# Altium PCB Zybo_Z7_Pcb.PcbDoc (part 1 of 8)
Units mm, origin at the board's own origin, x right, y up, seen from the top; angles counter-clockwise.
Board outline 122 x 88 mm, 8 copper layers (Top Layer, Layer 2, Layer 3, Layer 4, Layer 5, Layer 6, Layer 7, Bottom Layer), stack 1.625 mm thick; 658 components, 558 nets, 2538 pads, 924 vias.
Unrouted connection lines stored in the file: 1229.
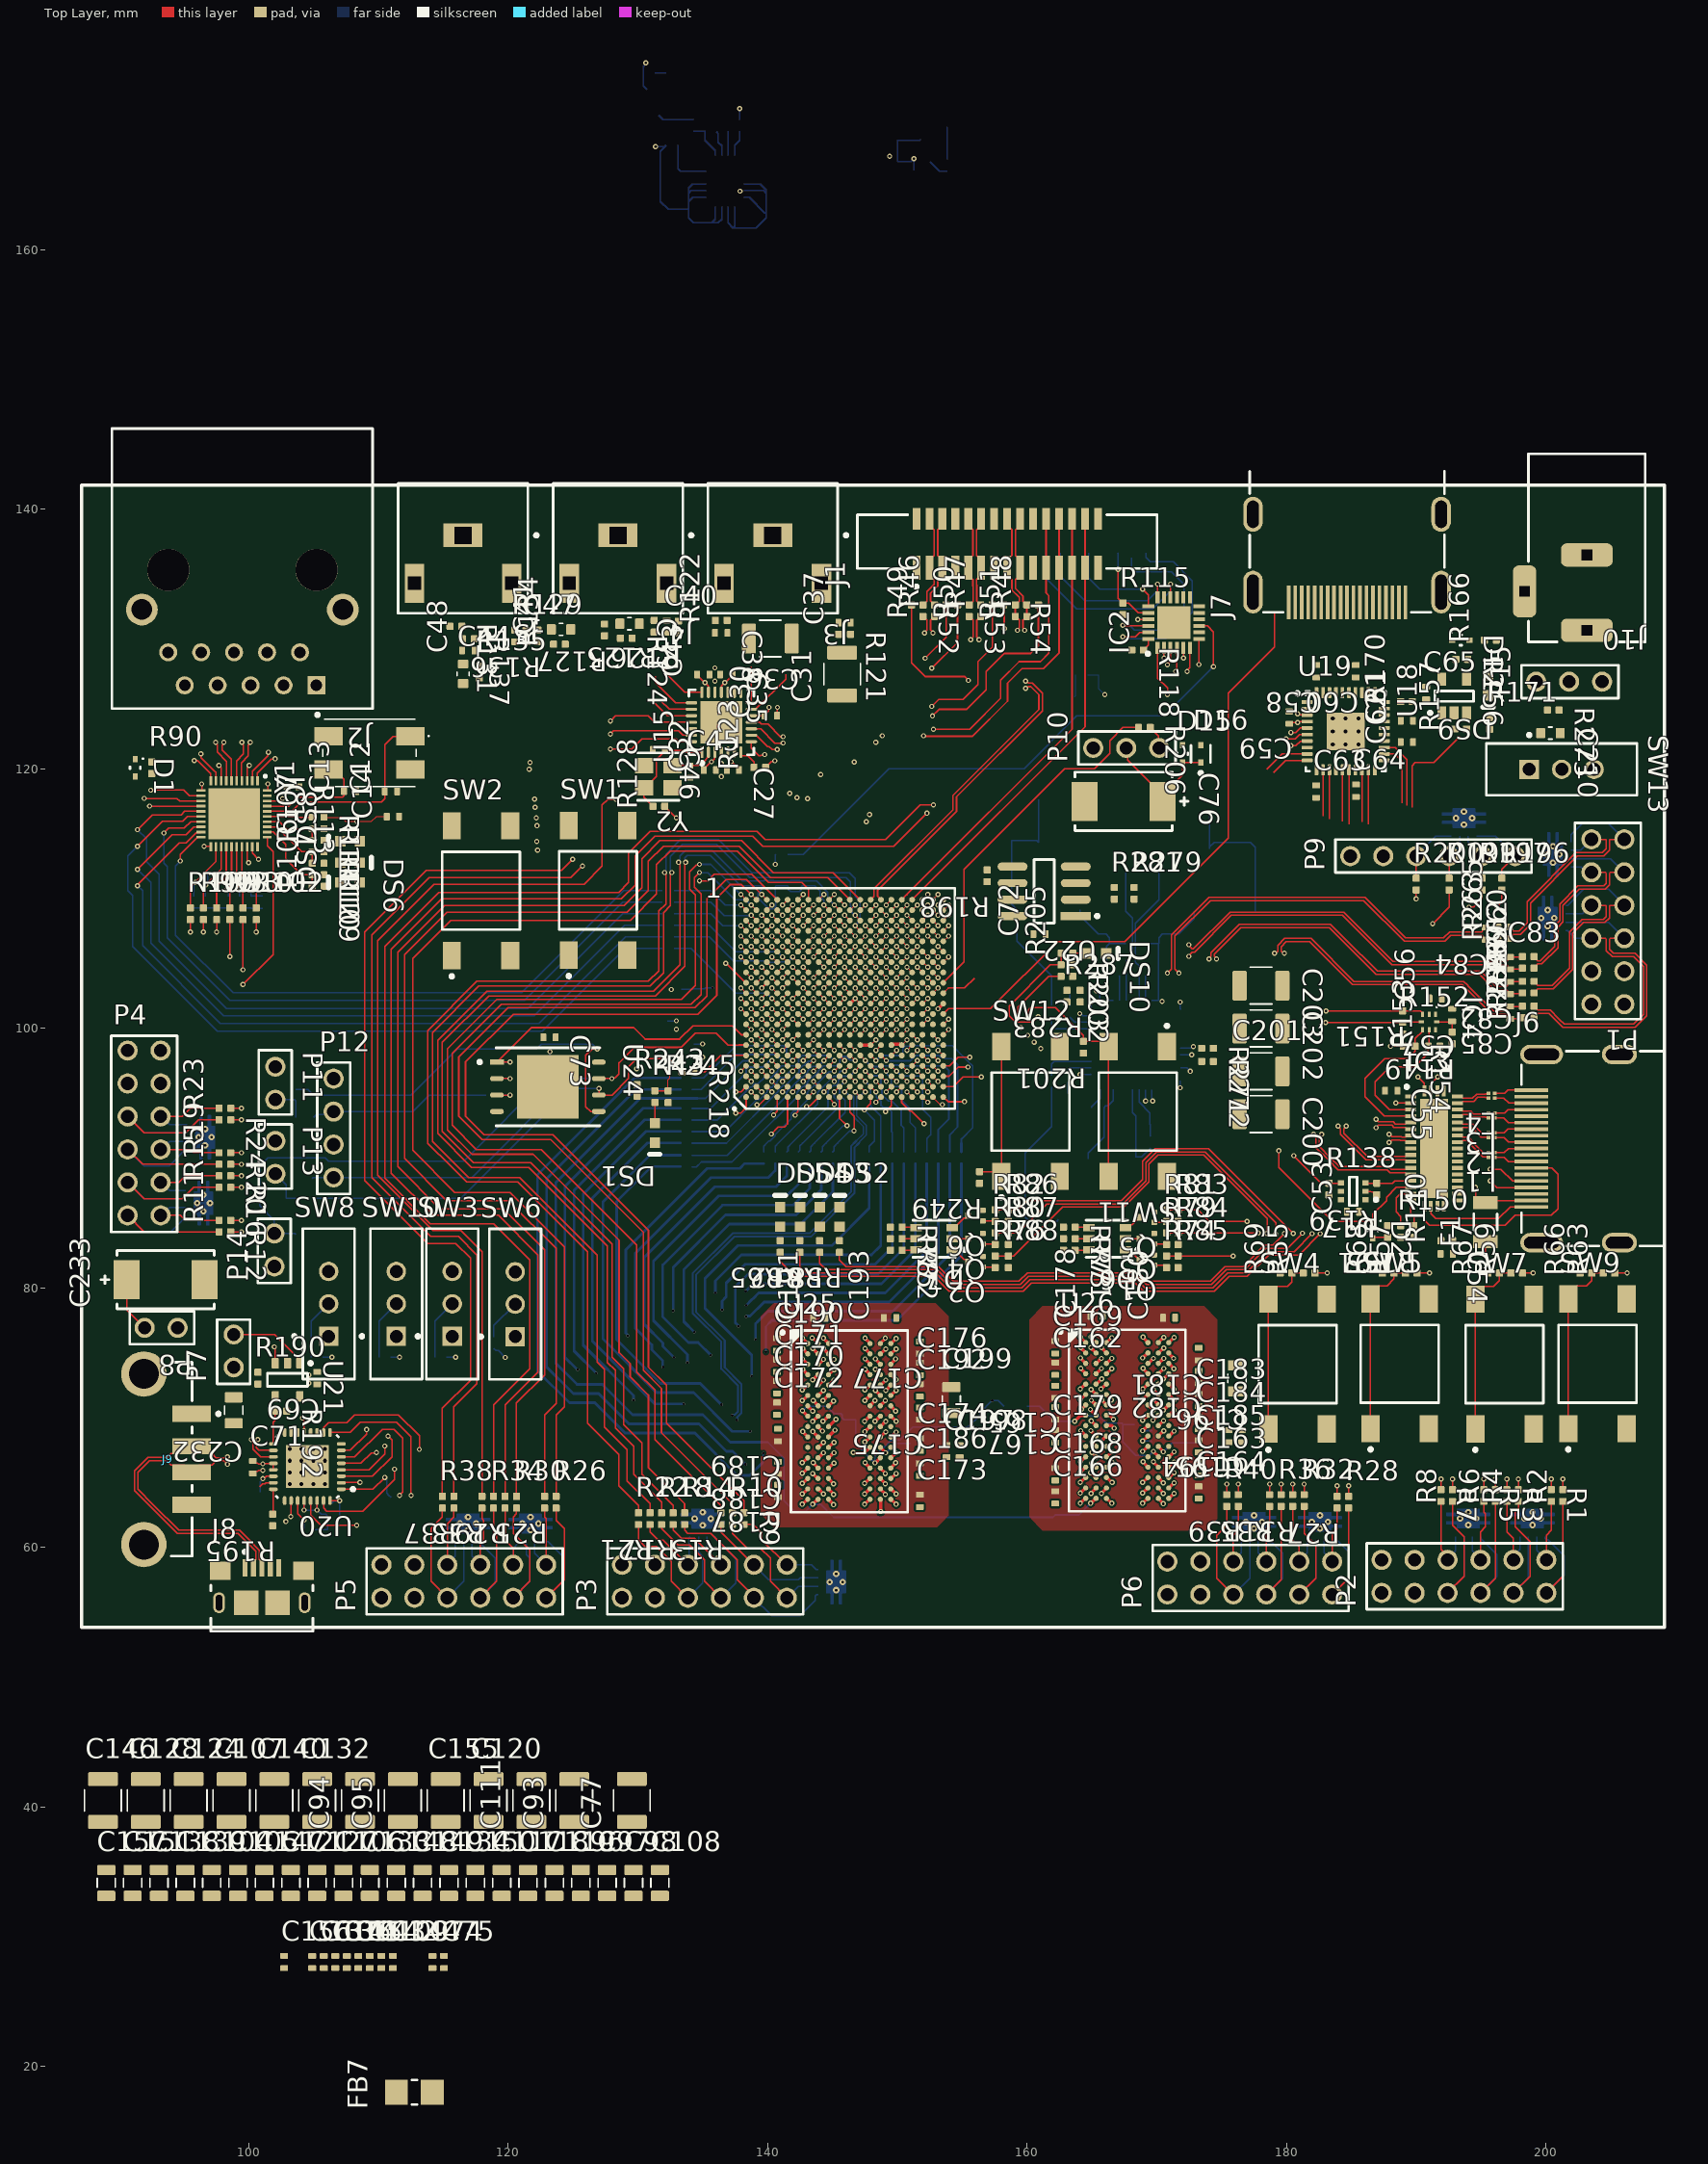
[diagram p0: Top Layer view]
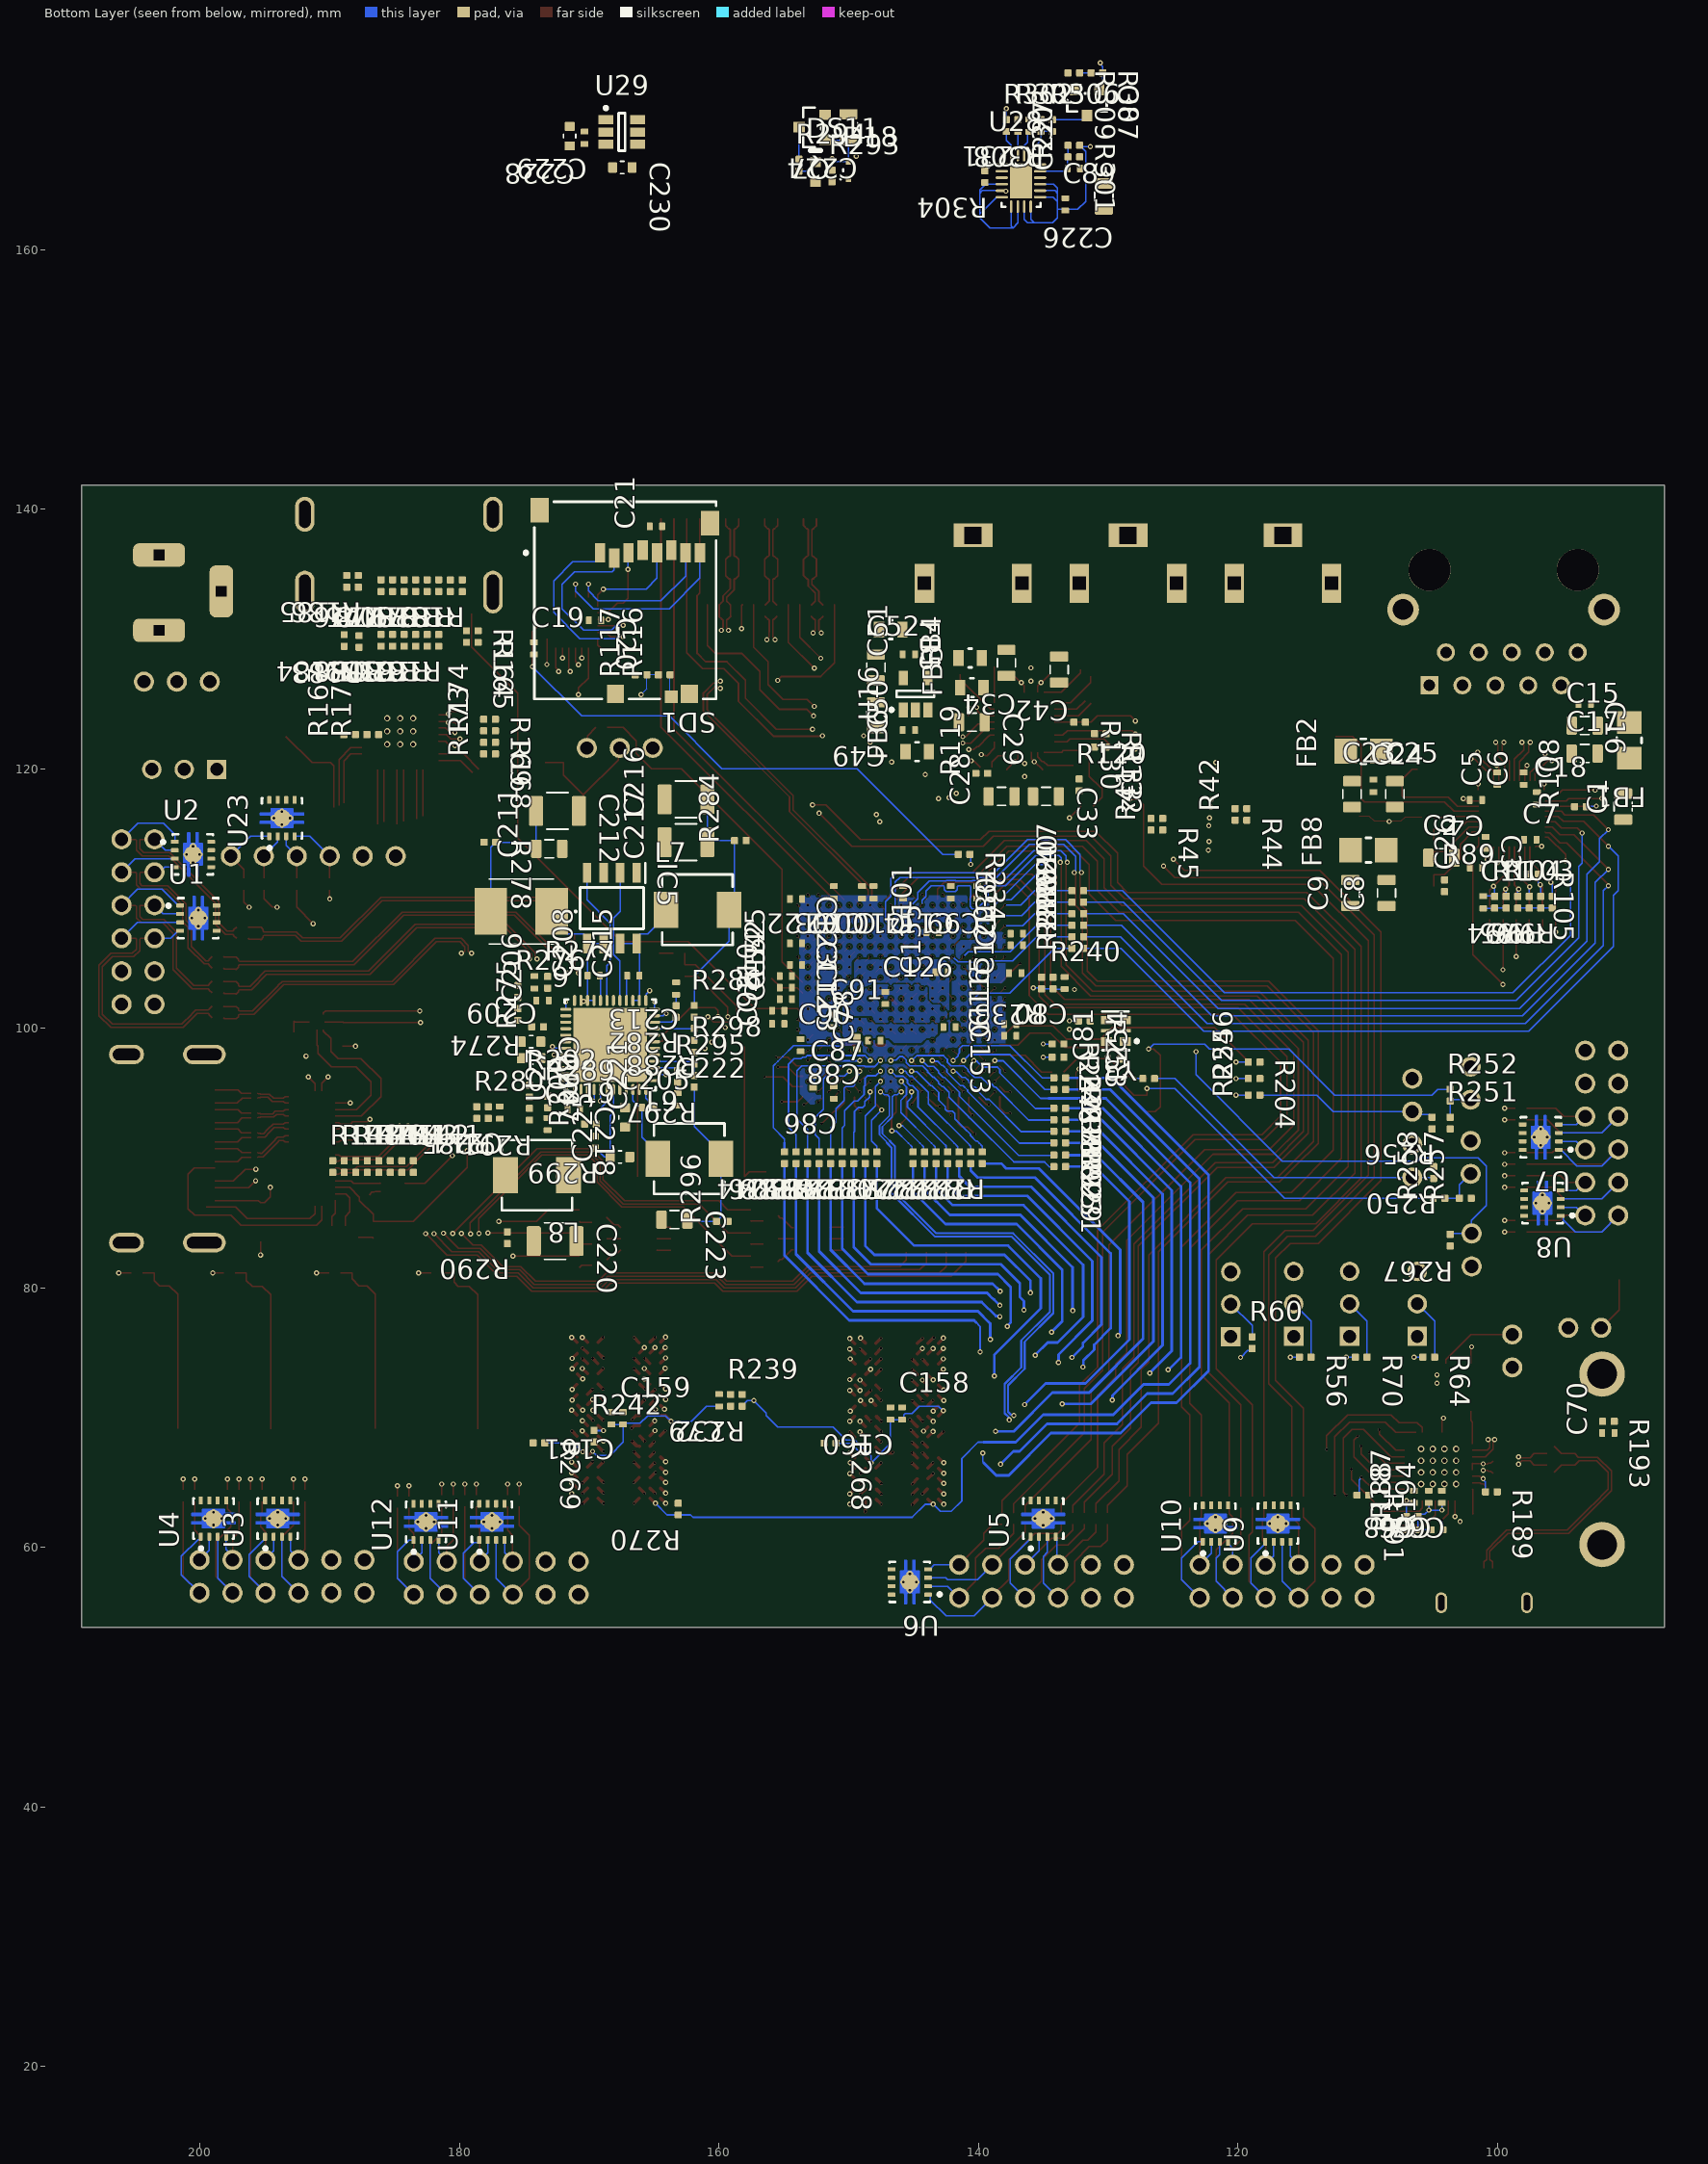
[diagram p1: Bottom Layer view, seen from below]
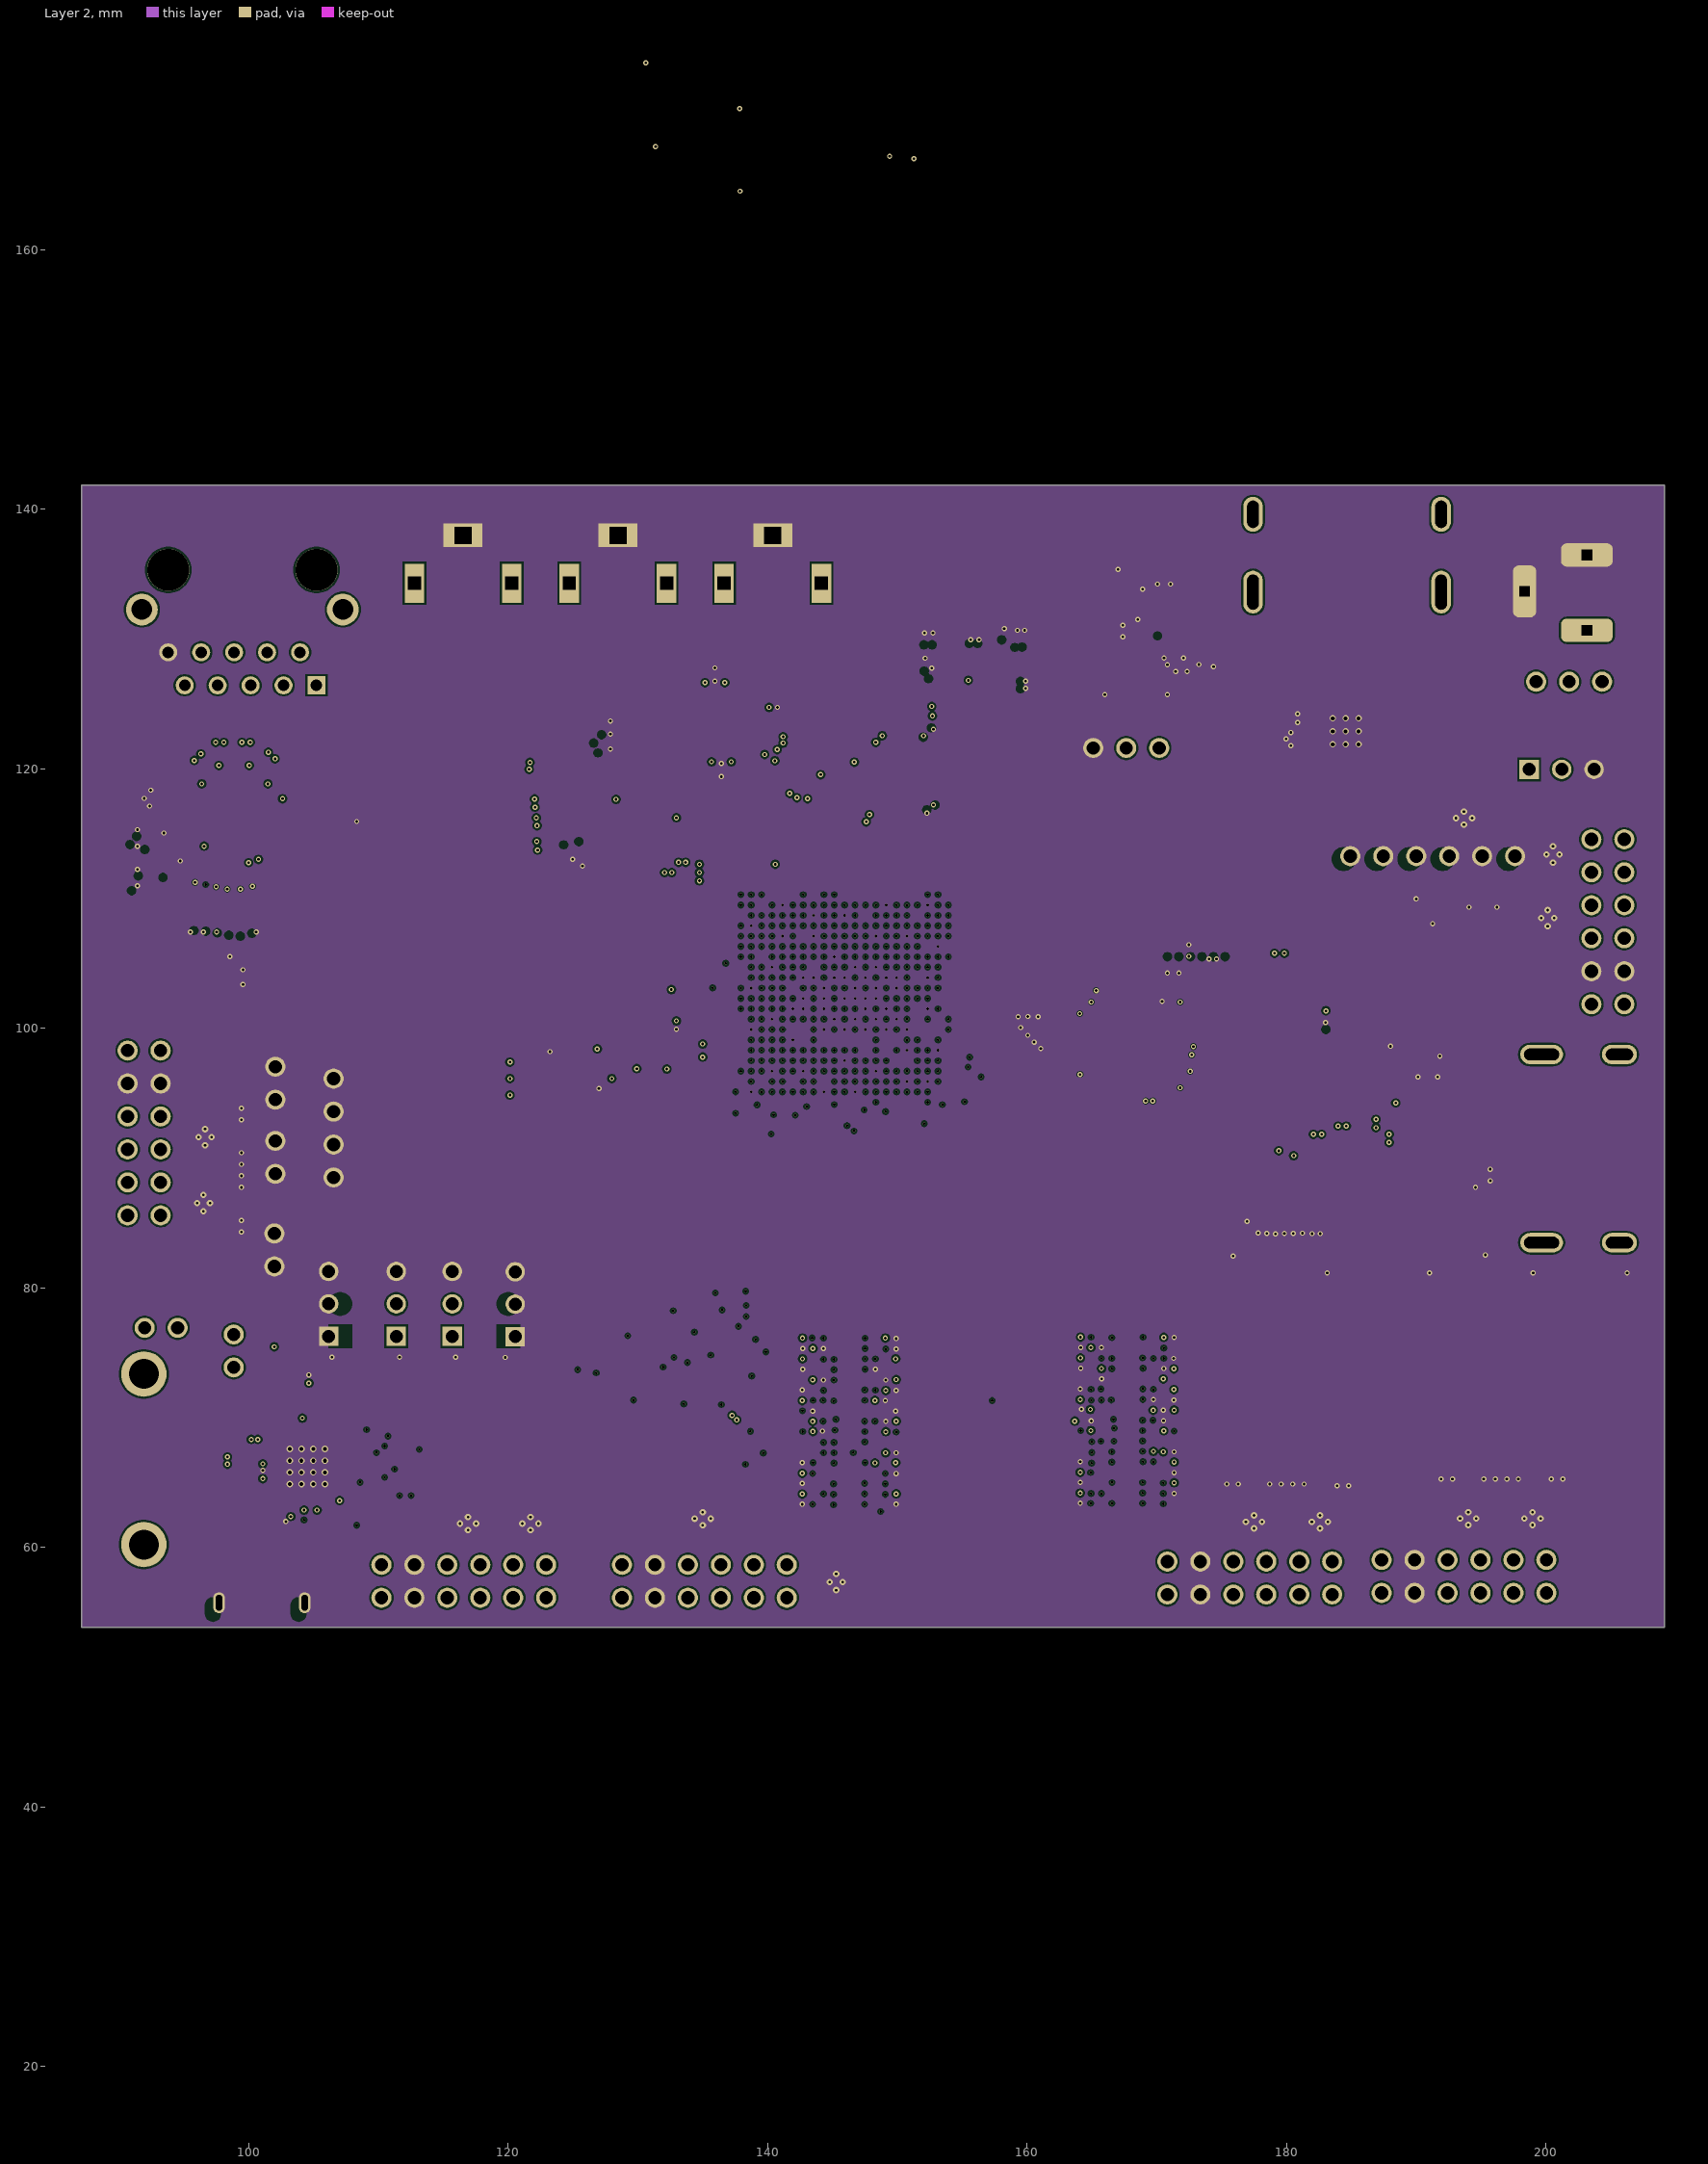
[diagram p2: Layer 2]
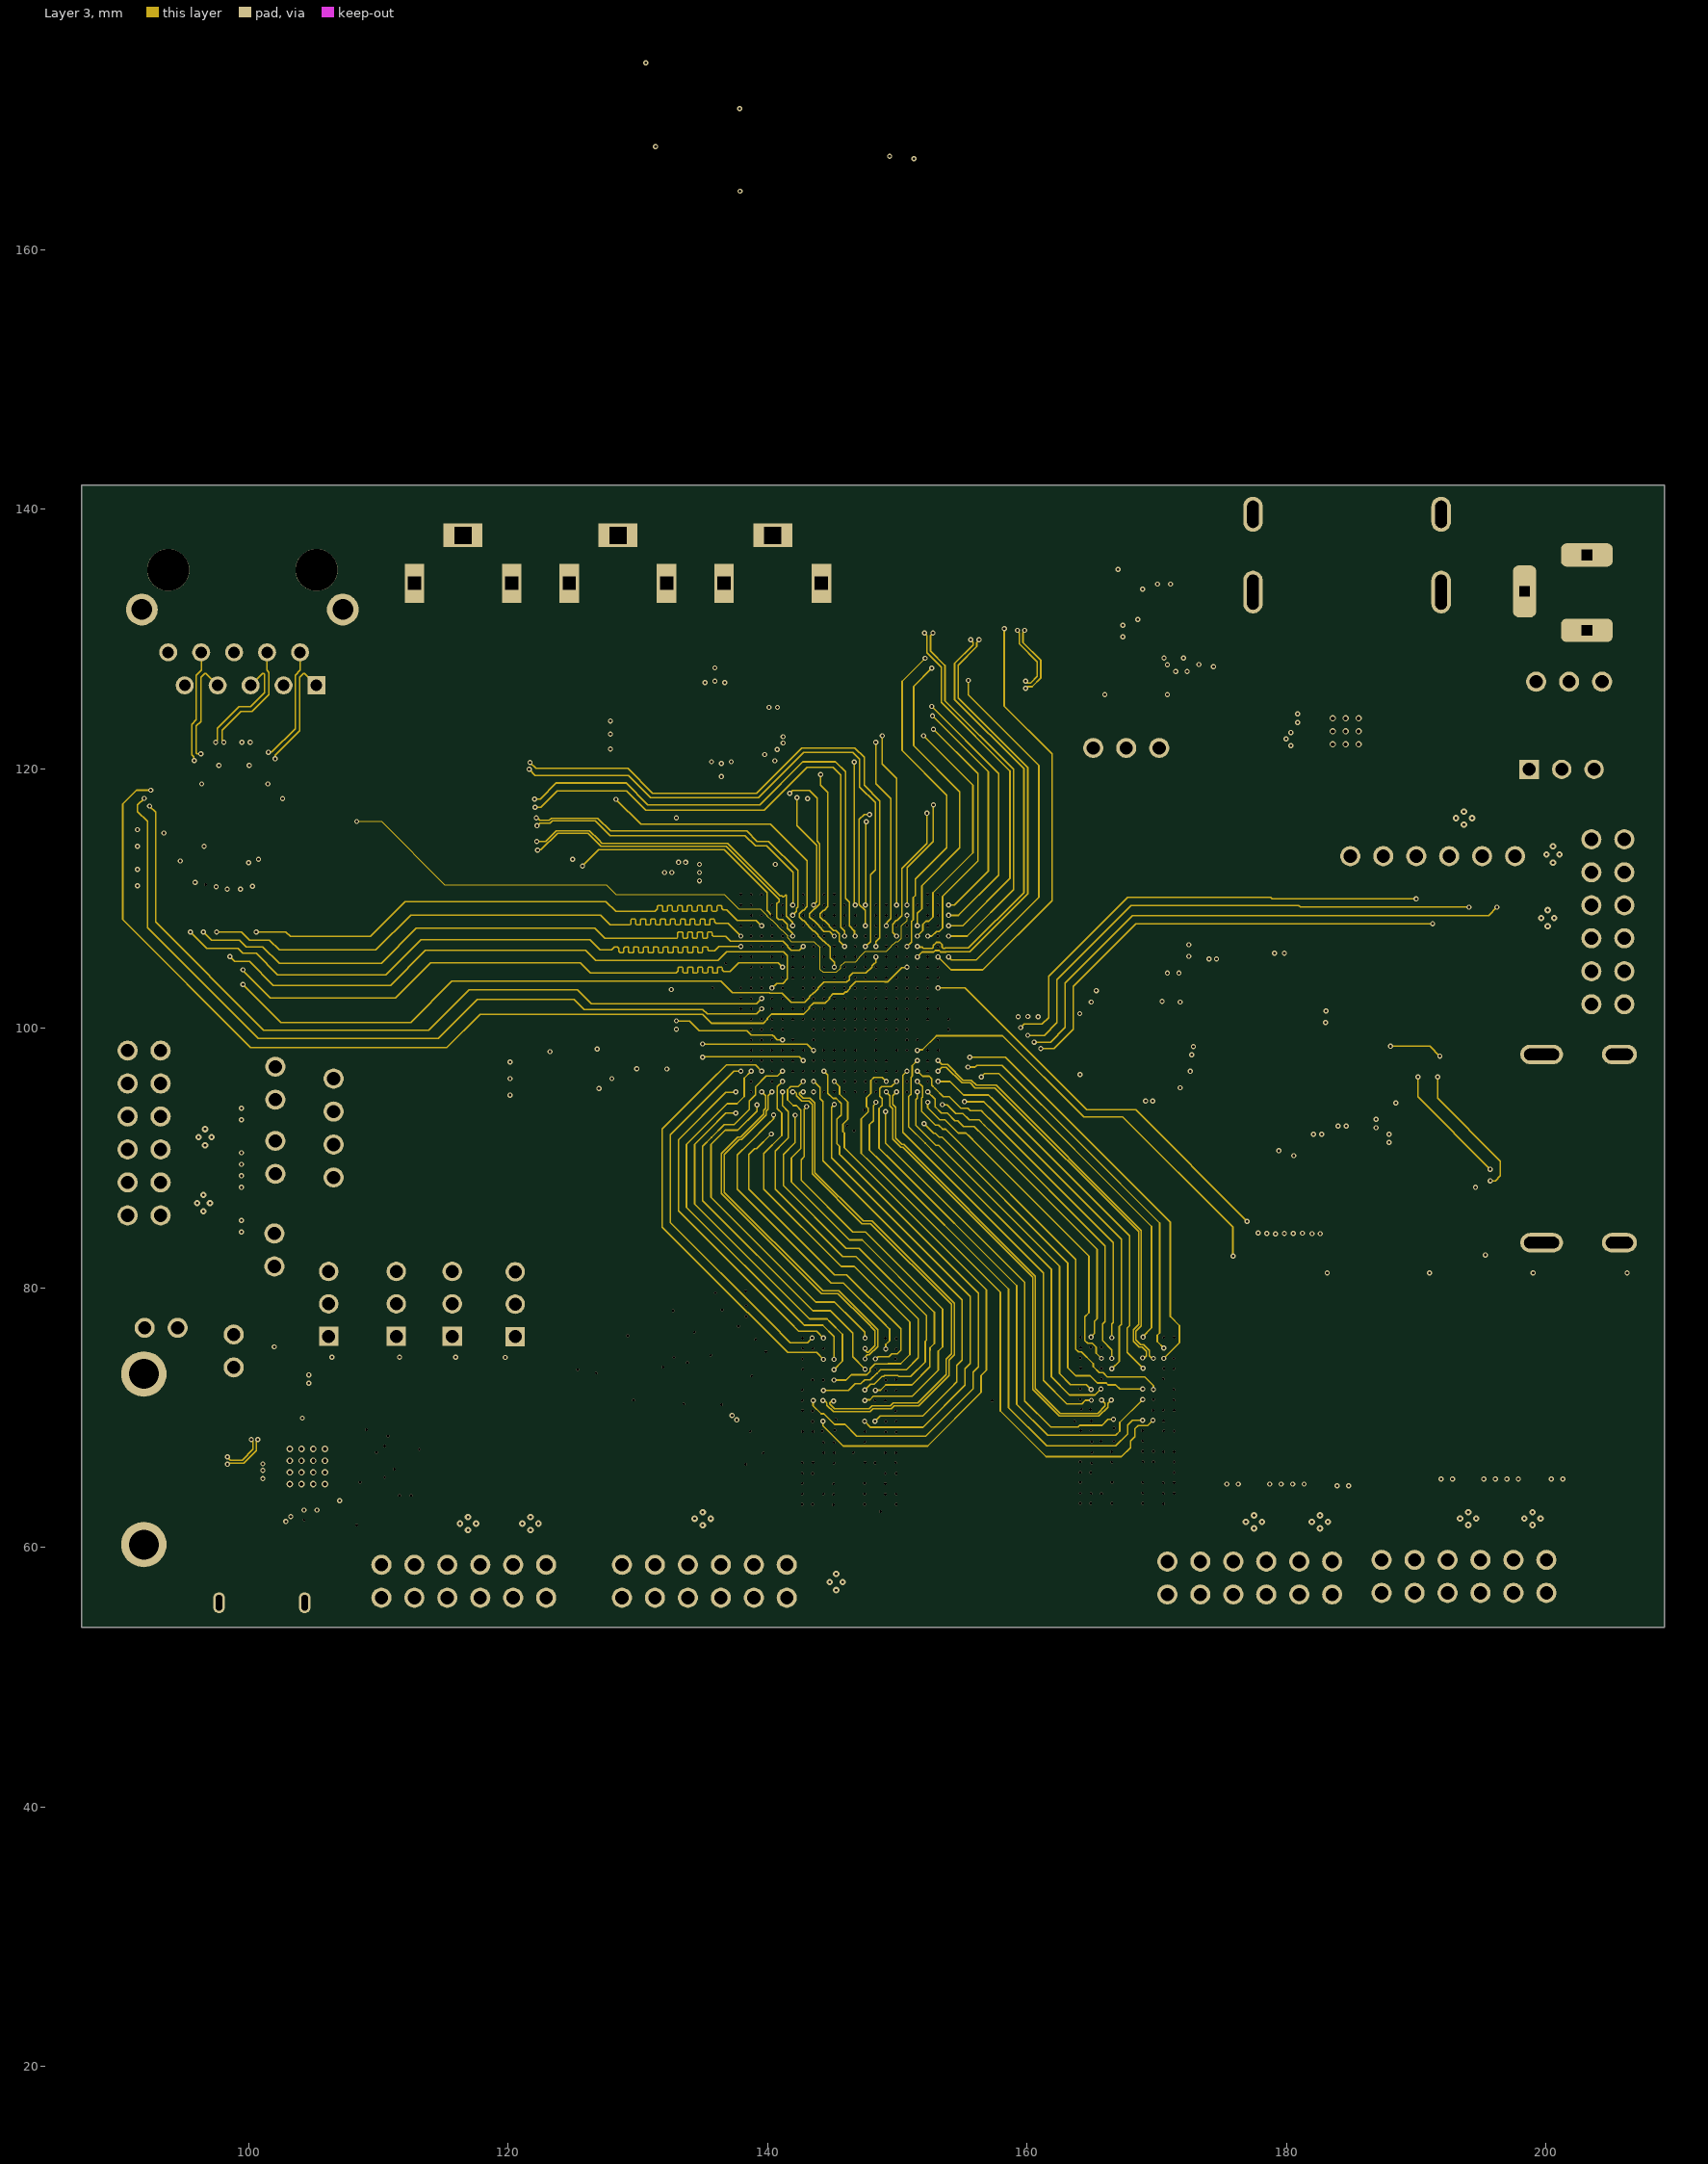
[diagram p3: Layer 3]
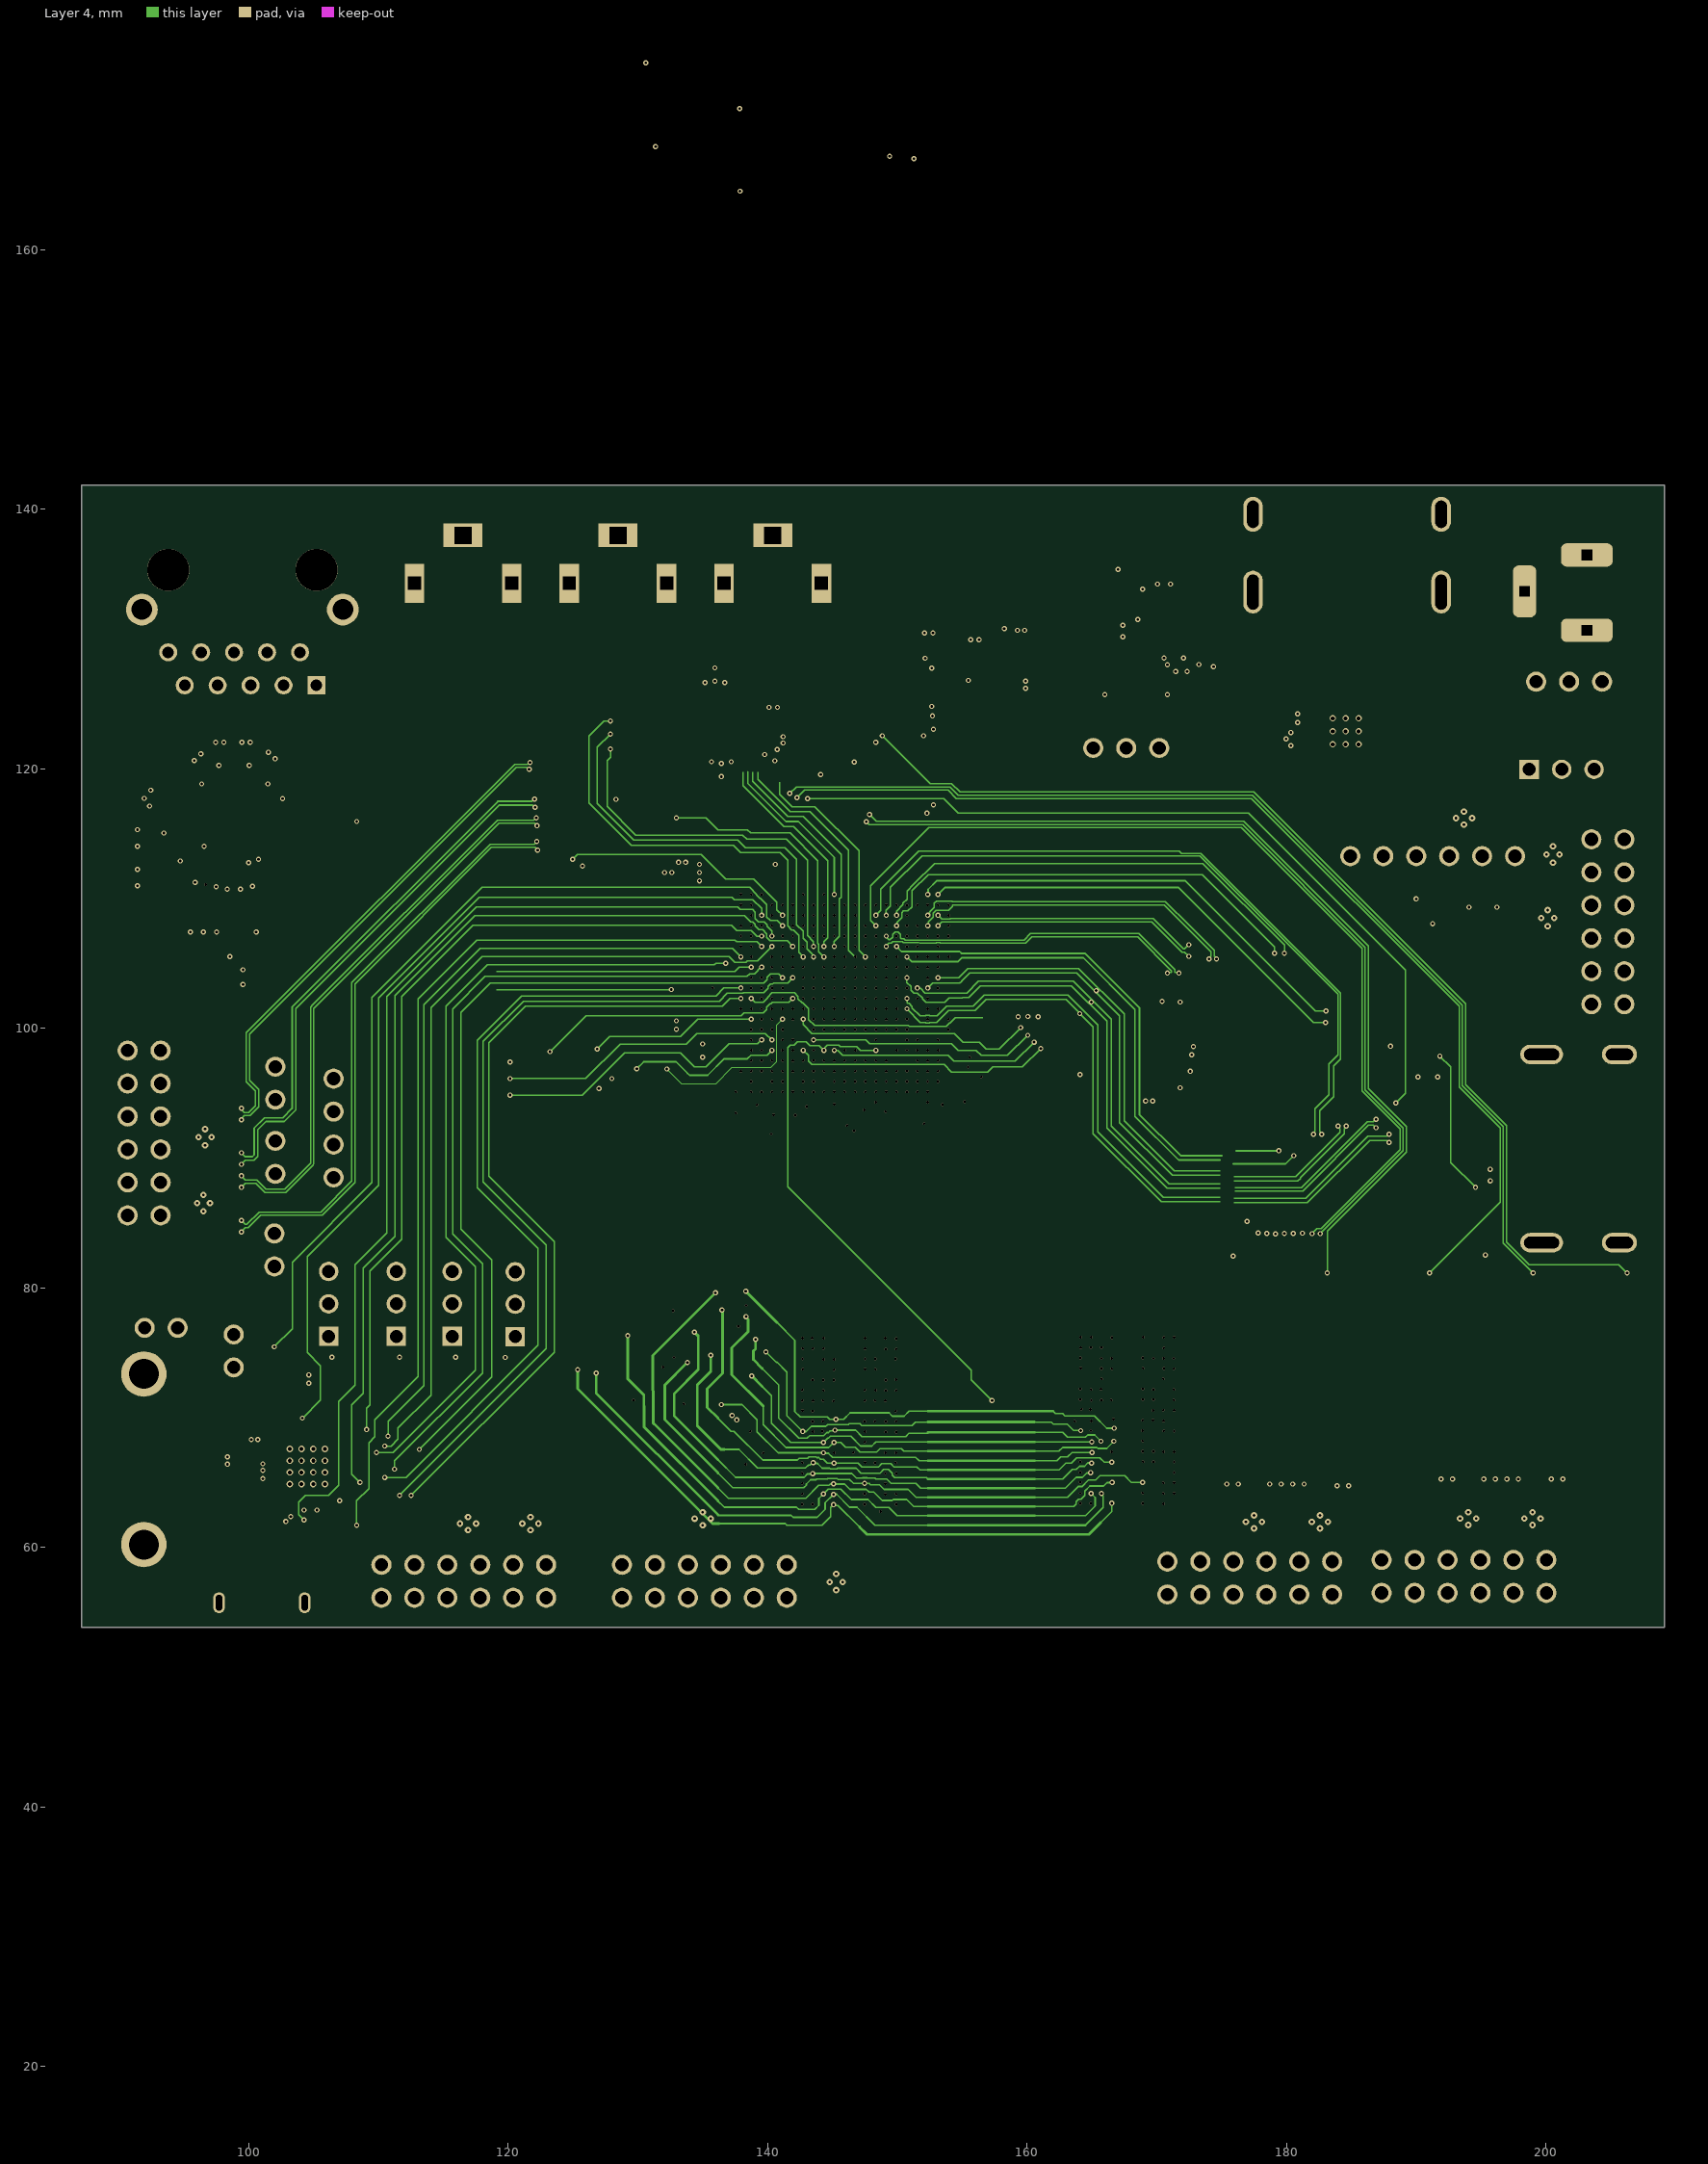
[diagram p4: Layer 4]
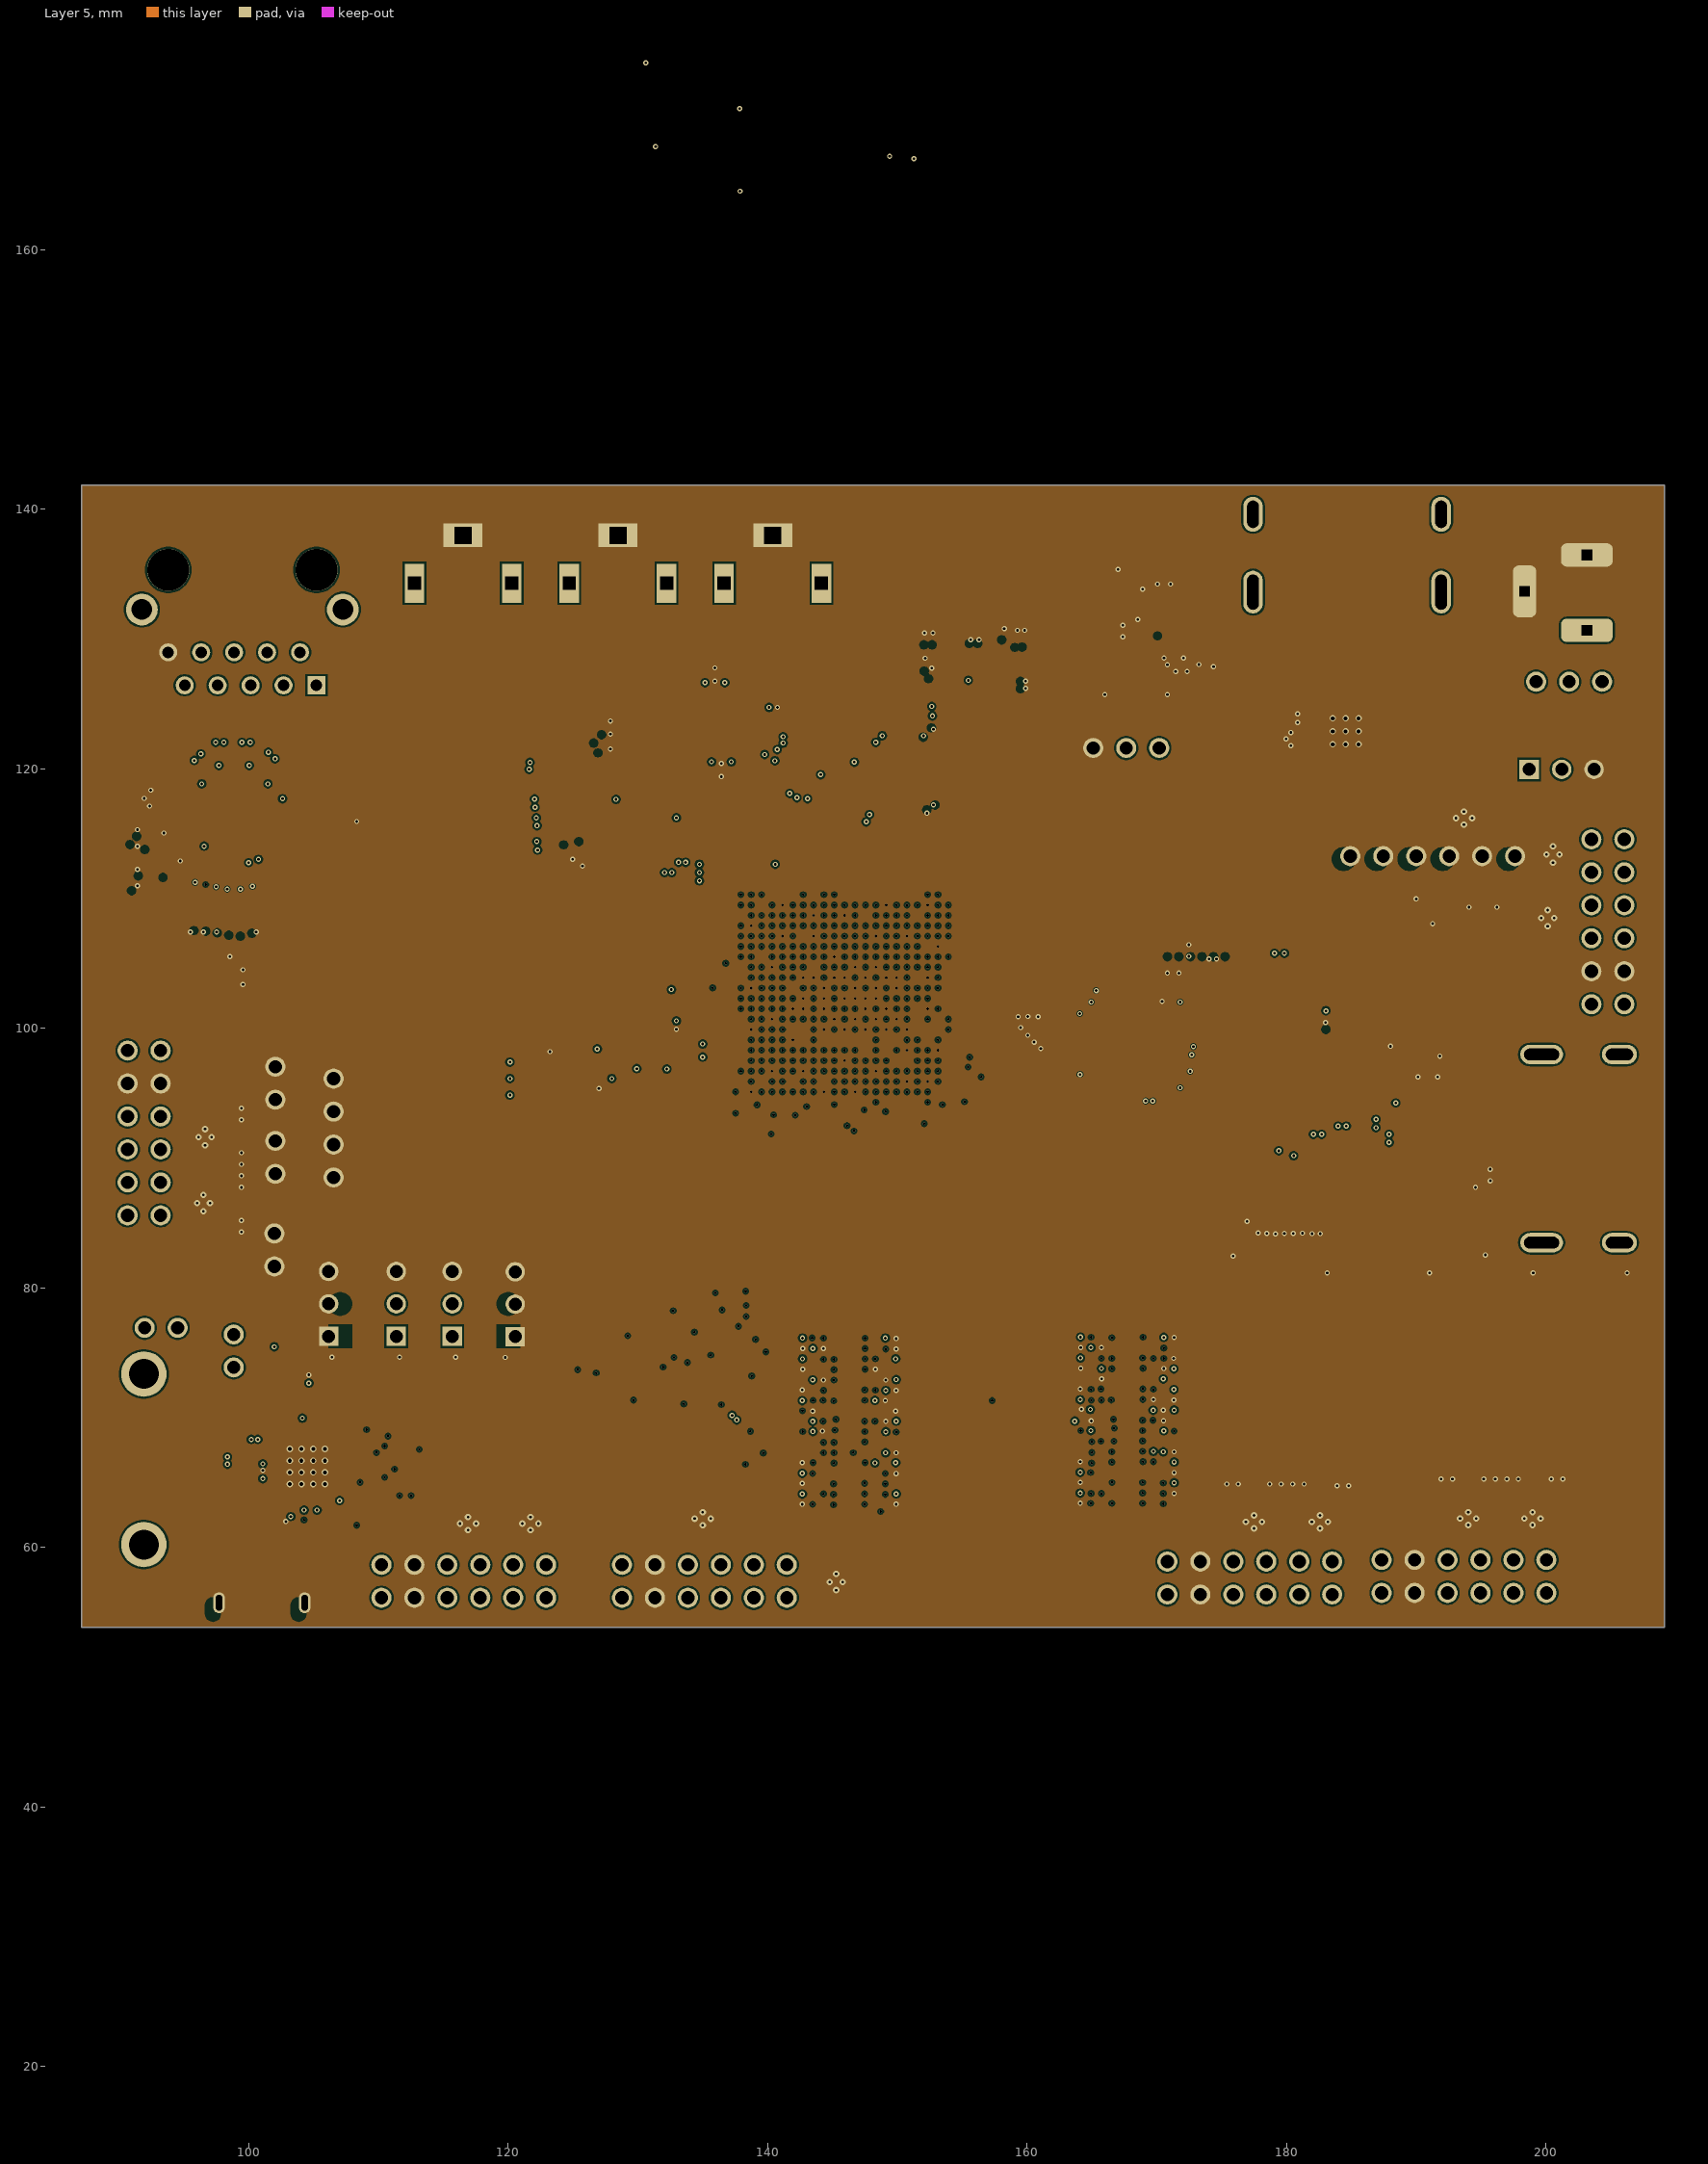
[diagram p5: Layer 5]
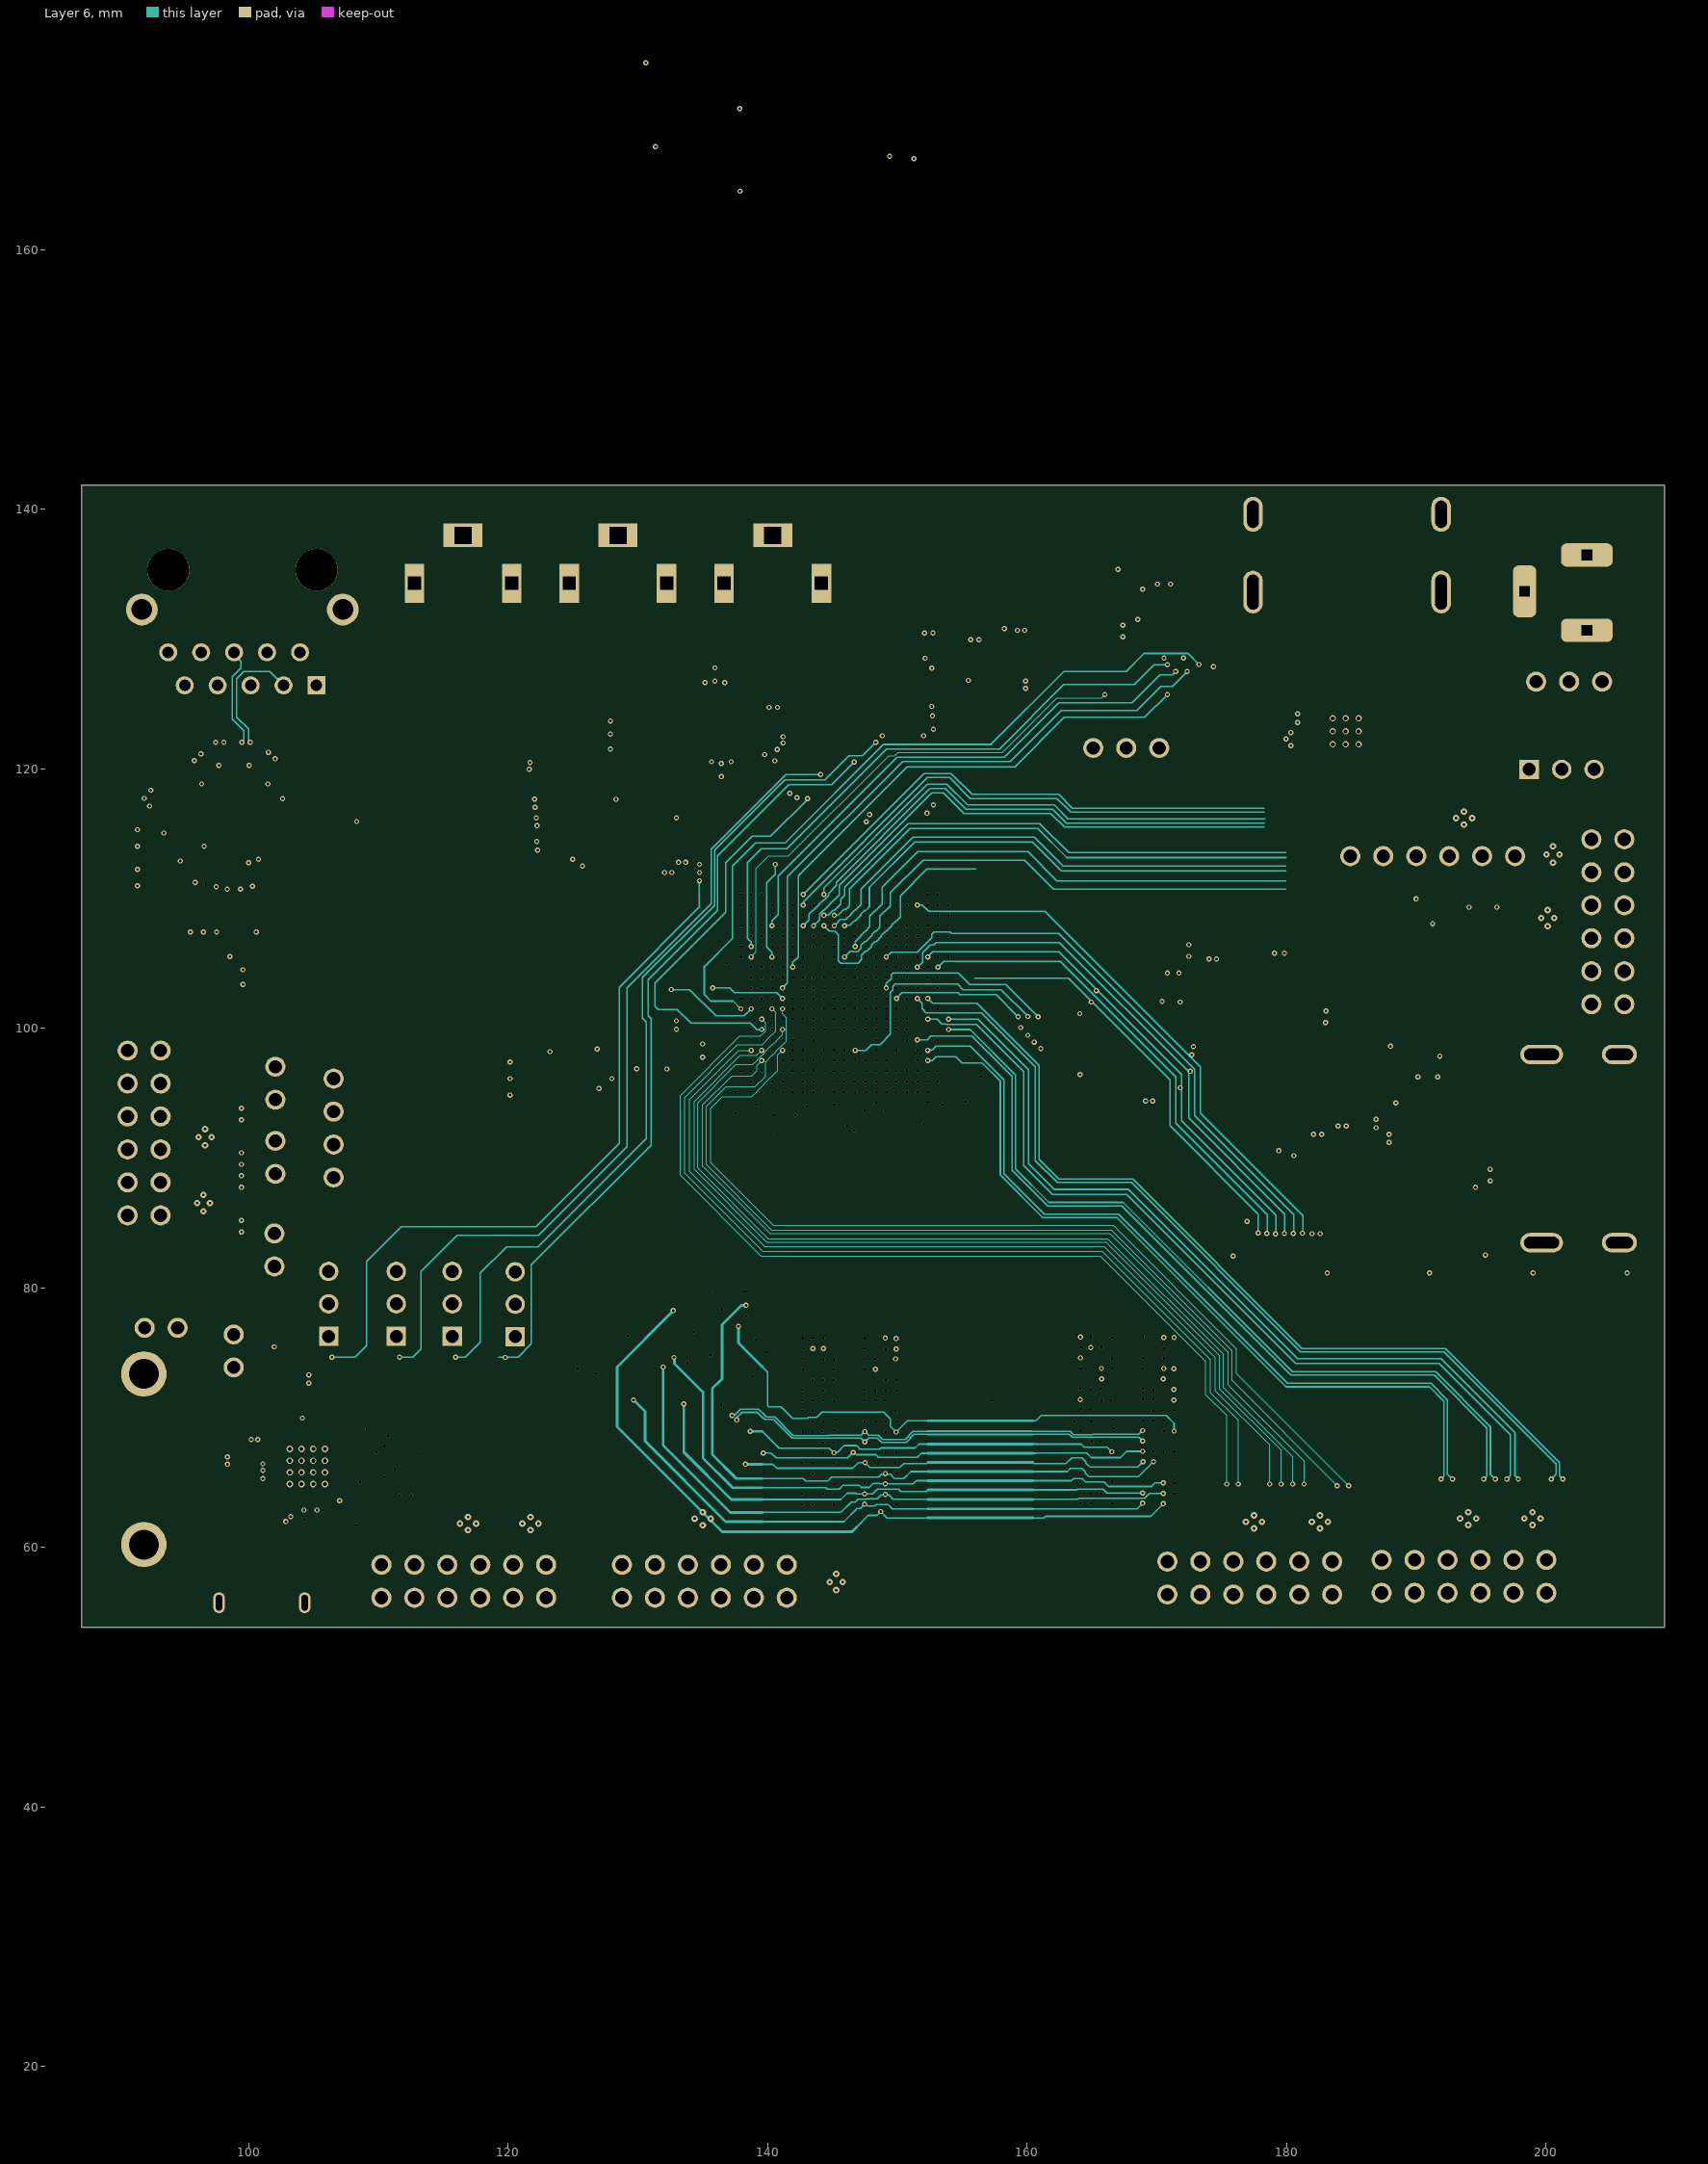
[diagram p6: Layer 6]
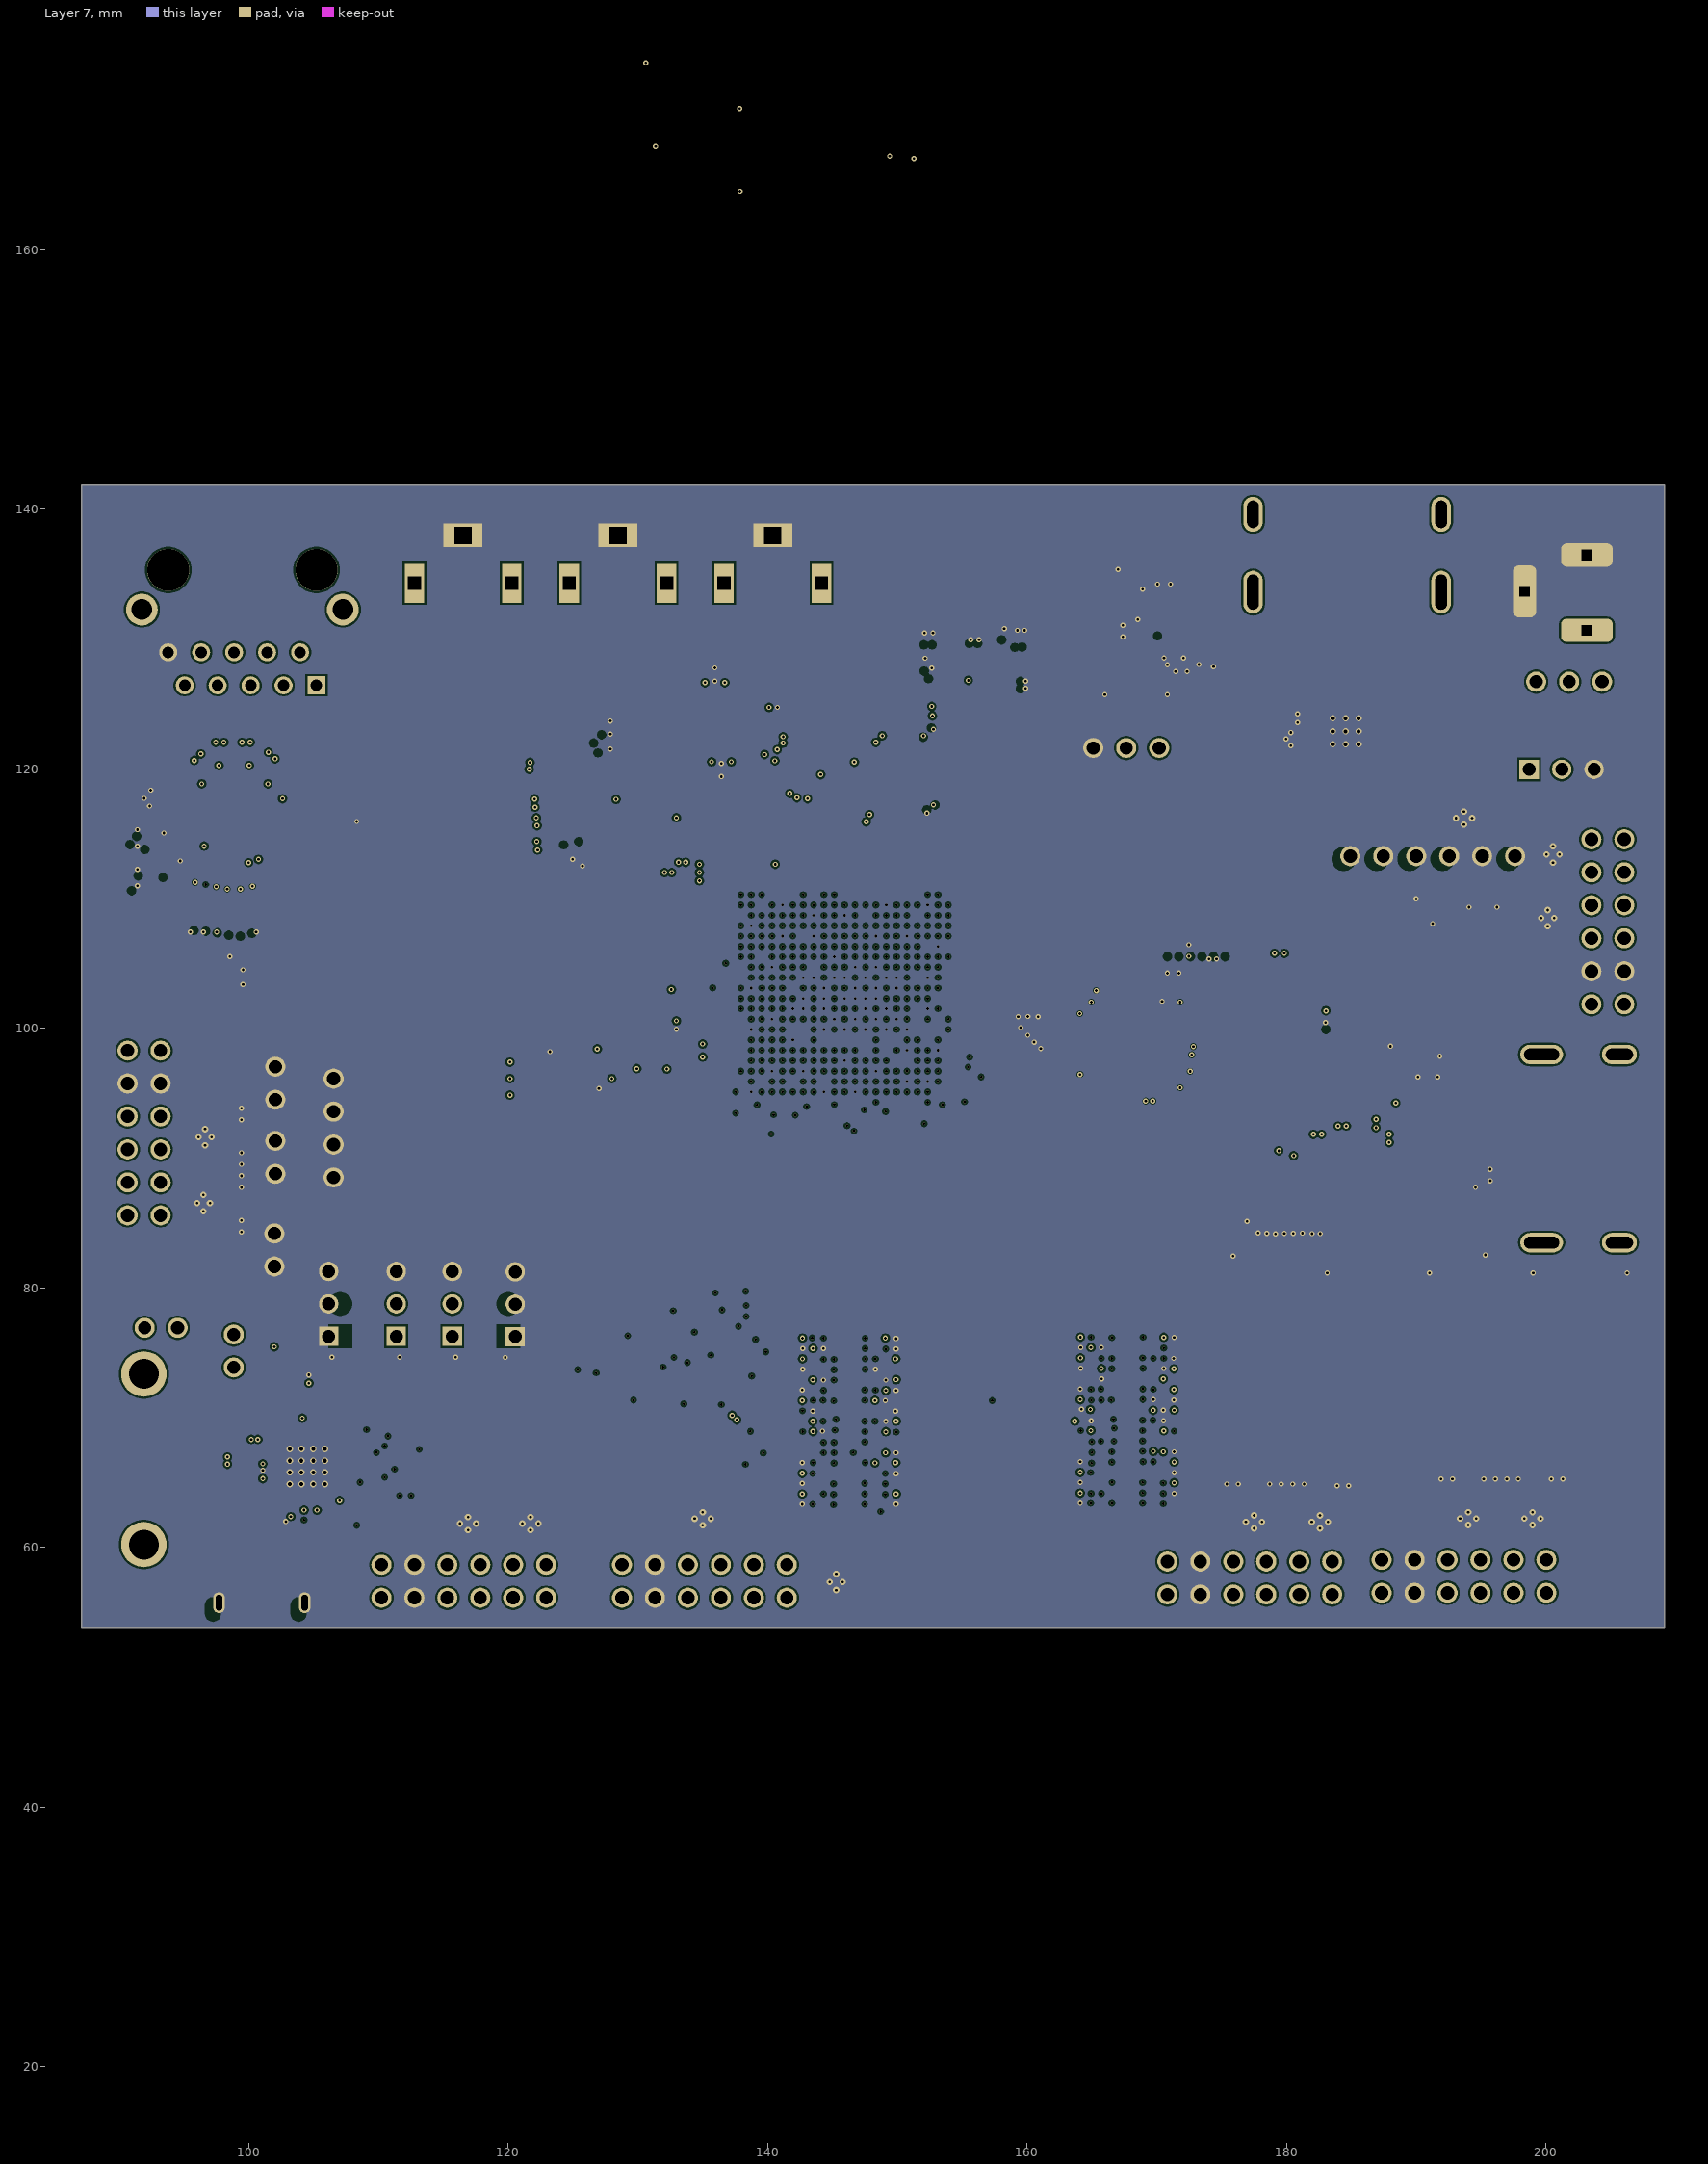
[diagram p7: Layer 7]

## Layer stack, top to bottom
Top Solder: solder mask 0.0102, Solder Resist, Dk 3.5
Top Layer: signal copper 0.0356
1080 RC67% 3.3mil: prepreg 0.0764, PP-006, Dk 3.91
Layer 2: signal copper 0.0152
Core1: prepreg 0.1, PP-006, Dk 4.36
Layer 3: signal copper 0.0152
Dielectric 6: prepreg 0.5048, PP-006, Dk 4.32
Layer 4: signal copper 0.0152
Core2: dielectric 0.1, FR-4, Dk 4.36
Layer 5: signal copper 0.0152
Dielectric 7: prepreg 0.5048, PP-006, Dk 4.32
Layer 6: signal copper 0.0152
Core3: prepreg 0.1, PP-006, Dk 4.36
Layer 7: signal copper 0.0152
Dielectric 3: prepreg 0.0764, PP-006, Dk 3.91
Bottom Layer: signal copper 0.0356
Bottom Solder: solder mask 0.0102, Solder Resist, Dk 3.5

## Board outline
87.122,53.859 87.122,141.859 209.122,141.859 209.122,53.859

## Design rules (kind name [scope] priority, off if disabled: settings)
Clearance DDR_ADR_CTRL_FPGA_Clearance [WithinRoom('DDR_ADR_CTRL_FPGA') and InNetClass('DDR_ADR_CTRL')] p1: gap=0.15 ignorepadtopadclearanceinfootprint=TRUE except(0.13: Arc-Arc Arc-Track Arc-Via Arc-Fill Arc-Poly Arc-Region Track-Track Track-Via Track-Fill Track-Poly Track-Region; 0.254: Arc-Text Track-Text SMDPad-Text THPad-Text Via-Text Fill-Text Poly-Text Region-Text Text-Text)
Clearance DDR_ADR_CTRL_DDR_Clearance [WithinRoom('DDR_1') or WithinRoom('DDR_2') and InNetClass('DDR_ADR_CTRL')] p2: gap=0.15 ignorepadtopadclearanceinfootprint=TRUE except(0.13: Arc-Arc Arc-Track Arc-Via Arc-Fill Arc-Poly Arc-Region Track-Track Track-Via Track-Fill Track-Poly Track-Region; 0.254: Arc-Text Track-Text SMDPad-Text THPad-Text Via-Text Fill-Text Poly-Text Region-Text Text-Text)
Clearance DDR_Data_Byte1_FPGA_Clearance [WithinRoom('DDR_B1_D_FPGA') and InNetClass('DDR_B1_D')] p3: gap=0.15 ignorepadtopadclearanceinfootprint=TRUE except(0.137: Arc-Arc Arc-Track Arc-Via Track-Track Track-Via; 0.254: Arc-Text Track-Text SMDPad-Text THPad-Text Via-Text Fill-Text Poly-Text Region-Text Text-Text)
Clearance DDR_Data_Byte1_DDR_Clearance [WithinRoom('DDR_1') or WithinRoom('DDR_2') and InNetClass('DDR_B1_D')] p4: gap=0.15 ignorepadtopadclearanceinfootprint=TRUE except(0.137: Arc-Arc Arc-Track Arc-Via Track-Track Track-Via; 0.254: Arc-Text Track-Text SMDPad-Text THPad-Text Via-Text Fill-Text Poly-Text Region-Text Text-Text)
Clearance DDR_Data_Byte2_FPGA_Clearance [WithinRoom('DDR_B2_D_FPGA') and InNetClass('DDR_B2_D')] p5: gap=0.15 ignorepadtopadclearanceinfootprint=TRUE except(0.137: Arc-Arc Arc-Track Arc-Via Track-Track Track-Via; 0.254: Arc-Text Track-Text SMDPad-Text THPad-Text Via-Text Fill-Text Poly-Text Region-Text Text-Text)
Clearance DDR_Data_Byte2_DDR_Clearance [WithinRoom('DDR_1') or WithinRoom('DDR_2') and InNetClass('DDR_B2_D')] p6: gap=0.15 ignorepadtopadclearanceinfootprint=TRUE except(0.137: Arc-Arc Arc-Track Arc-Via Track-Track Track-Via; 0.254: Arc-Text Track-Text SMDPad-Text THPad-Text Via-Text Fill-Text Poly-Text Region-Text Text-Text)
Clearance DDR_Data_Byte3_FPGA_Clearance [WithinRoom('DDR_B3_D_FPGA') and InNetClass('DDR_B3_D')] p7: gap=0.15 ignorepadtopadclearanceinfootprint=TRUE except(0.137: Arc-Arc Arc-Track Arc-Via Track-Track Track-Via; 0.254: Arc-Text Track-Text SMDPad-Text THPad-Text Via-Text Fill-Text Poly-Text Region-Text Text-Text)
Clearance DDR_Data_Byte3_DDR_Clearance [WithinRoom('DDR_1') or WithinRoom('DDR_2') and InNetClass('DDR_B3_D')] p8: gap=0.15 ignorepadtopadclearanceinfootprint=TRUE except(0.137: Arc-Arc Arc-Track Arc-Via Track-Track Track-Via; 0.254: Arc-Text Track-Text SMDPad-Text THPad-Text Via-Text Fill-Text Poly-Text Region-Text Text-Text)
Clearance DDR_Data_Byte4_FPGA_Clearance [WithinRoom('DDR_B4_D_FPGA') and InNetClass('DDR_B4_D')] p9: gap=0.15 ignorepadtopadclearanceinfootprint=TRUE except(0.137: Arc-Arc Arc-Track Arc-Via Track-Track Track-Via; 0.254: Arc-Text Track-Text SMDPad-Text THPad-Text Via-Text Fill-Text Poly-Text Region-Text Text-Text)
Clearance DDR_Data_Byte4_DDR_Clearance [WithinRoom('DDR_1') or WithinRoom('DDR_2') and InNetClass('DDR_B4_D')] p10: gap=0.15 ignorepadtopadclearanceinfootprint=TRUE except(0.137: Arc-Arc Arc-Track Arc-Via Track-Track Track-Via; 0.254: Arc-Text Track-Text SMDPad-Text THPad-Text Via-Text Fill-Text Poly-Text Region-Text Text-Text)
Clearance DDR_Data_Byte4_DDR_Clearance_1 [InNetClass('DDR_B4_D') or InNetClass('DDR_B3_D') or InNetClass('DDR_B2_D') or InNetClass('DDR_B1_D')] p11: gap=0.15 ignorepadtopadclearanceinfootprint=TRUE except(0.137: Arc-Via Track-Via; 0.254: Arc-Text Track-Text SMDPad-Text THPad-Text Via-Text Fill-Text Poly-Text Region-Text Text-Text; 0.5: Arc-Arc Arc-Track Track-Track)
Clearance DDR_ADR_CTRL_Clearance_DP [InNetClass('DDR_ADR_CTRL')] p12: gap=0.15 ignorepadtopadclearanceinfootprint=TRUE except(0.1: Arc-Via Arc-Fill Arc-Poly Arc-Region Arc-Hole Track-Via Track-Fill Track-Poly Track-Region Track-Hole THPad-Via Via-Via Via-Hole Fill-Fill Fill-Poly Fill-Region Poly-Poly Poly-Region Region-Region; 0.254: Arc-Text Track-Text SMDPad-Text THPad-Text Via-Text Fill-Text Poly-Text Region-Text Text-Text; 0.5: Arc-Arc Arc-Track Track-Track)
Clearance DDR_ADR_CTRL_Clearance [InNetClass('DDR_ADR_CTRL')] p13: gap=0.15 ignorepadtopadclearanceinfootprint=TRUE except(0.254: Arc-Text Track-Text SMDPad-Text THPad-Text Via-Text Fill-Text Poly-Text Region-Text Text-Text; 0.5: Arc-Arc Arc-Track Arc-Via Arc-Fill Arc-Poly Arc-Region Track-Track Track-Via Track-Fill Track-Poly Track-Region)
Clearance [All] p14: gap=0.15 ignorepadtopadclearanceinfootprint=TRUE except(0.137: Arc-Arc Arc-Track Arc-Via Track-Track Track-Via; 0.254: Arc-Text Track-Text SMDPad-Text THPad-Text Via-Text Fill-Text Poly-Text Region-Text Text-Text)
DiffPairsRouting MIPI_DP_Class [InNetClass('MIPI_Class') and IsDifferentialPair] p1: maxlimit=0.21 minlimit=0.127 mostfreqgap=0.21 toplayer_mingap=0.15 toplayer_maxgap=0.15 toplayer_prefgap=0.15 toplayer_minwidth=0.102 toplayer_maxwidth=0.102 toplayer_prefwidth=0.102 midlayer1_maxgap=0.127 midlayer1_prefgap=0.127 midlayer1_minwidth=0.059 midlayer1_maxwidth=0.059 midlayer1_prefwidth=0.059 midlayer2_mingap=0.21 midlayer2_minwidth=0.101 midlayer2_maxwidth=0.101 midlayer2_prefwidth=0.101 midlayer3_mingap=0.21 midlayer3_minwidth=0.101 midlayer3_maxwidth=0.101 midlayer3_prefwidth=0.101 midlayer4_maxgap=0.127 midlayer4_prefgap=0.127 midlayer4_minwidth=0.059 midlayer4_maxwidth=0.059 midlayer4_prefwidth=0.059 midlayer5_mingap=0.21 midlayer5_minwidth=0.101 midlayer5_maxwidth=0.101 midlayer5_prefwidth=0.101 midlayer6_mingap=0.21 midlayer6_minwidth=0.101 midlayer6_maxwidth=0.101 midlayer6_prefwidth=0.101 bottomlayer_mingap=0.15 bottomlayer_maxgap=0.15 bottomlayer_prefgap=0.15 bottomlayer_minwidth=0.102 bottomlayer_maxwidth=0.102 bottomlayer_prefwidth=0.102 impedanceprofiledriven=TRUE impedanceprofileid={E92BA9D7-9F86-4D2A-9F24-604D71054E3B} impedanceprofilevalue=100.000000 maxuncoupledlength=12.7
DiffPairsRouting DDR_ADR_CTRL_FPGA_DP_Width [WithinRoom('DDR_ADR_CTRL_FPGA') and InNetClass('DDR_ADR_CTRL')] p2: maxlimit=0.127 minlimit=0.1 mostfreqgap=0.127 toplayer_maxgap=0.1 toplayer_prefgap=0.1 toplayer_minwidth=0.122 toplayer_maxwidth=0.122 toplayer_prefwidth=0.122 midlayer1_mingap=0.127 midlayer1_minwidth=0.084 midlayer1_maxwidth=0.084 midlayer1_prefwidth=0.084 midlayer2_maxgap=0.1 midlayer2_prefgap=0.1 midlayer2_minwidth=0.104 midlayer2_maxwidth=0.104 midlayer2_prefwidth=0.104 midlayer3_maxgap=0.1 midlayer3_prefgap=0.1 midlayer3_minwidth=0.104 midlayer3_maxwidth=0.104 midlayer3_prefwidth=0.104 midlayer4_mingap=0.127 midlayer4_minwidth=0.084 midlayer4_maxwidth=0.084 midlayer4_prefwidth=0.084 midlayer5_maxgap=0.1 midlayer5_prefgap=0.1 midlayer5_minwidth=0.104 midlayer5_maxwidth=0.104 midlayer5_prefwidth=0.104 midlayer6_maxgap=0.1 midlayer6_prefgap=0.1 midlayer6_minwidth=0.104 midlayer6_maxwidth=0.104 midlayer6_prefwidth=0.104 bottomlayer_maxgap=0.1 bottomlayer_prefgap=0.1 bottomlayer_minwidth=0.122 bottomlayer_maxwidth=0.122 bottomlayer_prefwidth=0.122 maxuncoupledlength=12.7
DiffPairsRouting DDR_ADR_CTRL_DDR_DP_Width [WithinRoom('DDR_1') or WithinRoom('DDR_2') and InNetClass('DDR_ADR_CTRL')] p3: maxlimit=0.127 minlimit=0.1 mostfreqgap=0.127 toplayer_maxgap=0.1 toplayer_prefgap=0.1 toplayer_minwidth=0.122 toplayer_maxwidth=0.122 toplayer_prefwidth=0.122 midlayer1_mingap=0.127 midlayer1_minwidth=0.084 midlayer1_maxwidth=0.084 midlayer1_prefwidth=0.084 midlayer2_maxgap=0.1 midlayer2_prefgap=0.1 midlayer2_minwidth=0.104 midlayer2_maxwidth=0.104 midlayer2_prefwidth=0.104 midlayer3_maxgap=0.1 midlayer3_prefgap=0.1 midlayer3_minwidth=0.104 midlayer3_maxwidth=0.104 midlayer3_prefwidth=0.104 midlayer4_mingap=0.127 midlayer4_minwidth=0.084 midlayer4_maxwidth=0.084 midlayer4_prefwidth=0.084 midlayer5_maxgap=0.1 midlayer5_prefgap=0.1 midlayer5_minwidth=0.104 midlayer5_maxwidth=0.104 midlayer5_prefwidth=0.104 midlayer6_maxgap=0.1 midlayer6_prefgap=0.1 midlayer6_minwidth=0.104 midlayer6_maxwidth=0.104 midlayer6_prefwidth=0.104 bottomlayer_maxgap=0.1 bottomlayer_prefgap=0.1 bottomlayer_minwidth=0.122 bottomlayer_maxwidth=0.122 bottomlayer_prefwidth=0.122 maxuncoupledlength=12.7
DiffPairsRouting DDR_Data_Byte1_FPGA_DP_Width [WithinRoom('DDR_B1_D_FPGA') and InNetClass('DDR_B1_D')] p4: maxlimit=0.127 minlimit=0.1 mostfreqgap=0.127 toplayer_maxgap=0.1 toplayer_prefgap=0.1 toplayer_minwidth=0.122 toplayer_maxwidth=0.122 toplayer_prefwidth=0.122 midlayer1_mingap=0.127 midlayer1_minwidth=0.084 midlayer1_maxwidth=0.084 midlayer1_prefwidth=0.084 midlayer2_maxgap=0.1 midlayer2_prefgap=0.1 midlayer2_minwidth=0.104 midlayer2_maxwidth=0.104 midlayer2_prefwidth=0.104 midlayer3_maxgap=0.1 midlayer3_prefgap=0.1 midlayer3_minwidth=0.104 midlayer3_maxwidth=0.104 midlayer3_prefwidth=0.104 midlayer4_mingap=0.127 midlayer4_minwidth=0.084 midlayer4_maxwidth=0.084 midlayer4_prefwidth=0.084 midlayer5_maxgap=0.1 midlayer5_prefgap=0.1 midlayer5_minwidth=0.104 midlayer5_maxwidth=0.104 midlayer5_prefwidth=0.104 midlayer6_maxgap=0.1 midlayer6_prefgap=0.1 midlayer6_minwidth=0.104 midlayer6_maxwidth=0.104 midlayer6_prefwidth=0.104 bottomlayer_maxgap=0.1 bottomlayer_prefgap=0.1 bottomlayer_minwidth=0.122 bottomlayer_maxwidth=0.122 bottomlayer_prefwidth=0.122 maxuncoupledlength=12.7
DiffPairsRouting DDR_Data_Byte1_DDR_DP_Width [WithinRoom('DDR_1') or WithinRoom('DDR_2') and InNetClass('DDR_B1_D')] p5: maxlimit=0.127 minlimit=0.1 mostfreqgap=0.127 toplayer_maxgap=0.1 toplayer_prefgap=0.1 toplayer_minwidth=0.122 toplayer_maxwidth=0.122 toplayer_prefwidth=0.122 midlayer1_mingap=0.127 midlayer1_minwidth=0.084 midlayer1_maxwidth=0.084 midlayer1_prefwidth=0.084 midlayer2_maxgap=0.1 midlayer2_prefgap=0.1 midlayer2_minwidth=0.104 midlayer2_maxwidth=0.104 midlayer2_prefwidth=0.104 midlayer3_maxgap=0.1 midlayer3_prefgap=0.1 midlayer3_minwidth=0.104 midlayer3_maxwidth=0.104 midlayer3_prefwidth=0.104 midlayer4_mingap=0.127 midlayer4_minwidth=0.084 midlayer4_maxwidth=0.084 midlayer4_prefwidth=0.084 midlayer5_maxgap=0.1 midlayer5_prefgap=0.1 midlayer5_minwidth=0.104 midlayer5_maxwidth=0.104 midlayer5_prefwidth=0.104 midlayer6_maxgap=0.1 midlayer6_prefgap=0.1 midlayer6_minwidth=0.104 midlayer6_maxwidth=0.104 midlayer6_prefwidth=0.104 bottomlayer_maxgap=0.1 bottomlayer_prefgap=0.1 bottomlayer_minwidth=0.122 bottomlayer_maxwidth=0.122 bottomlayer_prefwidth=0.122 maxuncoupledlength=12.7
DiffPairsRouting DDR_Data_Byte2_FPGA_DP_Width [WithinRoom('DDR_B2_D_FPGA') and InNetClass('DDR_B2_D')] p6: maxlimit=0.127 minlimit=0.1 mostfreqgap=0.127 toplayer_maxgap=0.1 toplayer_prefgap=0.1 toplayer_minwidth=0.122 toplayer_maxwidth=0.122 toplayer_prefwidth=0.122 midlayer1_mingap=0.127 midlayer1_minwidth=0.084 midlayer1_maxwidth=0.084 midlayer1_prefwidth=0.084 midlayer2_maxgap=0.1 midlayer2_prefgap=0.1 midlayer2_minwidth=0.104 midlayer2_maxwidth=0.104 midlayer2_prefwidth=0.104 midlayer3_maxgap=0.1 midlayer3_prefgap=0.1 midlayer3_minwidth=0.104 midlayer3_maxwidth=0.104 midlayer3_prefwidth=0.104 midlayer4_mingap=0.127 midlayer4_minwidth=0.084 midlayer4_maxwidth=0.084 midlayer4_prefwidth=0.084 midlayer5_maxgap=0.1 midlayer5_prefgap=0.1 midlayer5_minwidth=0.104 midlayer5_maxwidth=0.104 midlayer5_prefwidth=0.104 midlayer6_maxgap=0.1 midlayer6_prefgap=0.1 midlayer6_minwidth=0.104 midlayer6_maxwidth=0.104 midlayer6_prefwidth=0.104 bottomlayer_maxgap=0.1 bottomlayer_prefgap=0.1 bottomlayer_minwidth=0.122 bottomlayer_maxwidth=0.122 bottomlayer_prefwidth=0.122 maxuncoupledlength=12.7
DiffPairsRouting DDR_Data_Byte2_DDR_DP_Width [WithinRoom('DDR_1') or WithinRoom('DDR_2') and InNetClass('DDR_B2_D')] p7: maxlimit=0.127 minlimit=0.1 mostfreqgap=0.127 toplayer_maxgap=0.1 toplayer_prefgap=0.1 toplayer_minwidth=0.122 toplayer_maxwidth=0.122 toplayer_prefwidth=0.122 midlayer1_mingap=0.127 midlayer1_minwidth=0.084 midlayer1_maxwidth=0.084 midlayer1_prefwidth=0.084 midlayer2_maxgap=0.1 midlayer2_prefgap=0.1 midlayer2_minwidth=0.104 midlayer2_maxwidth=0.104 midlayer2_prefwidth=0.104 midlayer3_maxgap=0.1 midlayer3_prefgap=0.1 midlayer3_minwidth=0.104 midlayer3_maxwidth=0.104 midlayer3_prefwidth=0.104 midlayer4_mingap=0.127 midlayer4_minwidth=0.084 midlayer4_maxwidth=0.084 midlayer4_prefwidth=0.084 midlayer5_maxgap=0.1 midlayer5_prefgap=0.1 midlayer5_minwidth=0.104 midlayer5_maxwidth=0.104 midlayer5_prefwidth=0.104 midlayer6_maxgap=0.1 midlayer6_prefgap=0.1 midlayer6_minwidth=0.104 midlayer6_maxwidth=0.104 midlayer6_prefwidth=0.104 bottomlayer_maxgap=0.1 bottomlayer_prefgap=0.1 bottomlayer_minwidth=0.122 bottomlayer_maxwidth=0.122 bottomlayer_prefwidth=0.122 maxuncoupledlength=12.7
DiffPairsRouting DDR_Data_Byte3_FPGA_DP_Width [WithinRoom('DDR_B3_D_FPGA') and InNetClass('DDR_B3_D')] p8: maxlimit=0.127 minlimit=0.1 mostfreqgap=0.127 toplayer_maxgap=0.1 toplayer_prefgap=0.1 toplayer_minwidth=0.122 toplayer_maxwidth=0.122 toplayer_prefwidth=0.122 midlayer1_mingap=0.127 midlayer1_minwidth=0.084 midlayer1_maxwidth=0.084 midlayer1_prefwidth=0.084 midlayer2_maxgap=0.1 midlayer2_prefgap=0.1 midlayer2_minwidth=0.104 midlayer2_maxwidth=0.104 midlayer2_prefwidth=0.104 midlayer3_maxgap=0.1 midlayer3_prefgap=0.1 midlayer3_minwidth=0.104 midlayer3_maxwidth=0.104 midlayer3_prefwidth=0.104 midlayer4_mingap=0.127 midlayer4_minwidth=0.084 midlayer4_maxwidth=0.084 midlayer4_prefwidth=0.084 midlayer5_maxgap=0.1 midlayer5_prefgap=0.1 midlayer5_minwidth=0.104 midlayer5_maxwidth=0.104 midlayer5_prefwidth=0.104 midlayer6_maxgap=0.1 midlayer6_prefgap=0.1 midlayer6_minwidth=0.104 midlayer6_maxwidth=0.104 midlayer6_prefwidth=0.104 bottomlayer_maxgap=0.1 bottomlayer_prefgap=0.1 bottomlayer_minwidth=0.122 bottomlayer_maxwidth=0.122 bottomlayer_prefwidth=0.122 maxuncoupledlength=12.7
DiffPairsRouting DDR_Data_Byte3_DDR_DP_Width [WithinRoom('DDR_1') or WithinRoom('DDR_2') and InNetClass('DDR_B3_D')] p9: maxlimit=0.127 minlimit=0.1 mostfreqgap=0.127 toplayer_maxgap=0.1 toplayer_prefgap=0.1 toplayer_minwidth=0.122 toplayer_maxwidth=0.122 toplayer_prefwidth=0.122 midlayer1_mingap=0.127 midlayer1_minwidth=0.084 midlayer1_maxwidth=0.084 midlayer1_prefwidth=0.084 midlayer2_maxgap=0.1 midlayer2_prefgap=0.1 midlayer2_minwidth=0.104 midlayer2_maxwidth=0.104 midlayer2_prefwidth=0.104 midlayer3_maxgap=0.1 midlayer3_prefgap=0.1 midlayer3_minwidth=0.104 midlayer3_maxwidth=0.104 midlayer3_prefwidth=0.104 midlayer4_mingap=0.127 midlayer4_minwidth=0.084 midlayer4_maxwidth=0.084 midlayer4_prefwidth=0.084 midlayer5_maxgap=0.1 midlayer5_prefgap=0.1 midlayer5_minwidth=0.104 midlayer5_maxwidth=0.104 midlayer5_prefwidth=0.104 midlayer6_maxgap=0.1 midlayer6_prefgap=0.1 midlayer6_minwidth=0.104 midlayer6_maxwidth=0.104 midlayer6_prefwidth=0.104 bottomlayer_maxgap=0.1 bottomlayer_prefgap=0.1 bottomlayer_minwidth=0.122 bottomlayer_maxwidth=0.122 bottomlayer_prefwidth=0.122 maxuncoupledlength=12.7
DiffPairsRouting DDR_Data_Byte4_FPGA_DP_Width [WithinRoom('DDR_B4_D_FPGA') and InNetClass('DDR_B4_D')] p10: maxlimit=0.127 minlimit=0.1 mostfreqgap=0.127 toplayer_maxgap=0.1 toplayer_prefgap=0.1 toplayer_minwidth=0.122 toplayer_maxwidth=0.122 toplayer_prefwidth=0.122 midlayer1_mingap=0.127 midlayer1_minwidth=0.084 midlayer1_maxwidth=0.084 midlayer1_prefwidth=0.084 midlayer2_maxgap=0.1 midlayer2_prefgap=0.1 midlayer2_minwidth=0.104 midlayer2_maxwidth=0.104 midlayer2_prefwidth=0.104 midlayer3_maxgap=0.1 midlayer3_prefgap=0.1 midlayer3_minwidth=0.104 midlayer3_maxwidth=0.104 midlayer3_prefwidth=0.104 midlayer4_mingap=0.127 midlayer4_minwidth=0.084 midlayer4_maxwidth=0.084 midlayer4_prefwidth=0.084 midlayer5_maxgap=0.1 midlayer5_prefgap=0.1 midlayer5_minwidth=0.104 midlayer5_maxwidth=0.104 midlayer5_prefwidth=0.104 midlayer6_maxgap=0.1 midlayer6_prefgap=0.1 midlayer6_minwidth=0.104 midlayer6_maxwidth=0.104 midlayer6_prefwidth=0.104 bottomlayer_maxgap=0.1 bottomlayer_prefgap=0.1 bottomlayer_minwidth=0.122 bottomlayer_maxwidth=0.122 bottomlayer_prefwidth=0.122 maxuncoupledlength=12.7
DiffPairsRouting DDR_Data_Byte4_DDR_DP_Width [WithinRoom('DDR_1') or WithinRoom('DDR_2') and InNetClass('DDR_B4_D')] p11: maxlimit=0.127 minlimit=0.1 mostfreqgap=0.127 toplayer_maxgap=0.1 toplayer_prefgap=0.1 toplayer_minwidth=0.122 toplayer_maxwidth=0.122 toplayer_prefwidth=0.122 midlayer1_mingap=0.127 midlayer1_minwidth=0.084 midlayer1_maxwidth=0.084 midlayer1_prefwidth=0.084 midlayer2_maxgap=0.1 midlayer2_prefgap=0.1 midlayer2_minwidth=0.104 midlayer2_maxwidth=0.104 midlayer2_prefwidth=0.104 midlayer3_maxgap=0.1 midlayer3_prefgap=0.1 midlayer3_minwidth=0.104 midlayer3_maxwidth=0.104 midlayer3_prefwidth=0.104 midlayer4_mingap=0.127 midlayer4_minwidth=0.084 midlayer4_maxwidth=0.084 midlayer4_prefwidth=0.084 midlayer5_maxgap=0.1 midlayer5_prefgap=0.1 midlayer5_minwidth=0.104 midlayer5_maxwidth=0.104 midlayer5_prefwidth=0.104 midlayer6_maxgap=0.1 midlayer6_prefgap=0.1 midlayer6_minwidth=0.104 midlayer6_maxwidth=0.104 midlayer6_prefwidth=0.104 bottomlayer_maxgap=0.1 bottomlayer_prefgap=0.1 bottomlayer_minwidth=0.122 bottomlayer_maxwidth=0.122 bottomlayer_prefwidth=0.122 maxuncoupledlength=12.7
DiffPairsRouting DDR_Data_Bytes_DDR_DP_Width [InNetClass('DDR_B4_D') or InNetClass('DDR_B3_D') or InNetClass('DDR_B2_D') or InNetClass('DDR_B1_D')] p12: maxlimit=0.127 minlimit=0.1 mostfreqgap=0.127 toplayer_maxgap=0.1 toplayer_prefgap=0.1 toplayer_minwidth=0.122 toplayer_maxwidth=0.122 toplayer_prefwidth=0.122 midlayer1_mingap=0.127 midlayer1_minwidth=0.084 midlayer1_maxwidth=0.084 midlayer1_prefwidth=0.084 midlayer2_maxgap=0.1 midlayer2_prefgap=0.1 midlayer2_minwidth=0.104 midlayer2_maxwidth=0.104 midlayer2_prefwidth=0.104 midlayer3_maxgap=0.1 midlayer3_prefgap=0.1 midlayer3_minwidth=0.104 midlayer3_maxwidth=0.104 midlayer3_prefwidth=0.104 midlayer4_mingap=0.127 midlayer4_minwidth=0.084 midlayer4_maxwidth=0.084 midlayer4_prefwidth=0.084 midlayer5_maxgap=0.1 midlayer5_prefgap=0.1 midlayer5_minwidth=0.104 midlayer5_maxwidth=0.104 midlayer5_prefwidth=0.104 midlayer6_maxgap=0.1 midlayer6_prefgap=0.1 midlayer6_minwidth=0.104 midlayer6_maxwidth=0.104 midlayer6_prefwidth=0.104 bottomlayer_maxgap=0.1 bottomlayer_prefgap=0.1 bottomlayer_minwidth=0.122 bottomlayer_maxwidth=0.122 bottomlayer_prefwidth=0.122 maxuncoupledlength=12.7
DiffPairsRouting DDR_ADR_CTRL_DP_Width [InNetClass('DDR_ADR_CTRL')] p13: maxlimit=0.127 minlimit=0.1 mostfreqgap=0.127 toplayer_maxgap=0.1 toplayer_prefgap=0.1 toplayer_minwidth=0.16 toplayer_maxwidth=0.16 toplayer_prefwidth=0.16 midlayer1_mingap=0.127 midlayer1_minwidth=0.109 midlayer1_maxwidth=0.109 midlayer1_prefwidth=0.109 midlayer2_maxgap=0.1 midlayer2_prefgap=0.1 midlayer2_minwidth=0.143 midlayer2_maxwidth=0.143 midlayer2_prefwidth=0.143 midlayer3_maxgap=0.1 midlayer3_prefgap=0.1 midlayer3_minwidth=0.143 midlayer3_maxwidth=0.143 midlayer3_prefwidth=0.143 midlayer4_mingap=0.127 midlayer4_minwidth=0.109 midlayer4_maxwidth=0.109 midlayer4_prefwidth=0.109 midlayer5_maxgap=0.1 midlayer5_prefgap=0.1 midlayer5_minwidth=0.143 midlayer5_maxwidth=0.143 midlayer5_prefwidth=0.143 midlayer6_maxgap=0.1 midlayer6_prefgap=0.1 midlayer6_minwidth=0.143 midlayer6_maxwidth=0.143 midlayer6_prefwidth=0.143 bottomlayer_maxgap=0.1 bottomlayer_prefgap=0.1 bottomlayer_minwidth=0.16 bottomlayer_maxwidth=0.16 bottomlayer_prefwidth=0.16 impedanceprofiledriven=TRUE impedanceprofileid={FAC106AB-765B-4638-B188-FE730DC5E872} impedanceprofilevalue=76.000000 maxuncoupledlength=12.7
DiffPairsRouting [All] p14: maxlimit=0.254 minlimit=0.1 mostfreqgap=0.15 toplayer_minwidth=0.1 toplayer_maxwidth=0.381 toplayer_prefwidth=0.15 midlayer1_minwidth=0.1 midlayer1_maxwidth=0.381 midlayer1_prefwidth=0.15 midlayer2_minwidth=0.1 midlayer2_maxwidth=0.381 midlayer2_prefwidth=0.15 midlayer3_minwidth=0.1 midlayer3_maxwidth=0.381 midlayer3_prefwidth=0.15 midlayer4_minwidth=0.1 midlayer4_maxwidth=0.381 midlayer4_prefwidth=0.15 midlayer5_minwidth=0.1 midlayer5_maxwidth=0.381 midlayer5_prefwidth=0.15 midlayer6_minwidth=0.1 midlayer6_maxwidth=0.381 midlayer6_prefwidth=0.15 bottomlayer_minwidth=0.1 bottomlayer_maxwidth=0.381 bottomlayer_prefwidth=0.15 maxuncoupledlength=12.7
PlaneConnect [All] p1: planeconnectstyle=Direct reliefexpansion=0.508 reliefentries=4 reliefconductorwidth=0.254 reliefairgap=0.254
PolygonConnect [All] p1: connectstyle=Direct reliefconductorwidth=0.254 reliefentries=4 polygonreliefangle="90 Angle" airgapwidth=0.254
RoomDefinition DDR_1 [False vs False] p1: confinementstyle=ConfineIn formatcopy=TRUE lockcomponents=FALSE outline 136.184,77.368 152.349,77.368 152.349,61.595 136.184,61.595
RoomDefinition DDR_2 [False] p2: confinementstyle=ConfineIn formatcopy=TRUE lockcomponents=FALSE outline 160.579,70.581 160.579,62.491 161.163,61.925 171.145,61.925 171.856,62.614 171.856,77.294 170.993,78.13 163.957,78.13 163.195,77.393 163.195,71.073 162.687,70.581
RoomDefinition DDR_ADR_CTRL_FPGA [InComponentClass('Components Class3')] p3: confinementstyle=ConfineIn formatcopy=TRUE lockcomponents=FALSE outline 137.209,99.212 135.433,97.46 135.433,91.846 136.128,91.161 156.512,91.161 156.718,91.364 156.718,97.917 155.431,99.187 137.518,99.187 137.492,99.212
RoomDefinition DDR_B4_D_FPGA [InComponentClass('Components Class2')] p4: confinementstyle=ConfineIn formatcopy=TRUE lockcomponents=FALSE outline 151.614,97.811 151.155,97.391 151.155,92.324 151.844,91.694 157.222,91.694 157.353,91.814 157.353,97.391 156.861,97.841 152.401,97.841 152.369,97.811
RoomDefinition DDR_B3_D_FPGA [InComponentClass('Components Class1')] p5: confinementstyle=ConfineIn formatcopy=TRUE lockcomponents=FALSE outline 147.687,97.79 147.168,97.307 147.168,89.891 147.386,89.687 152.715,89.687 152.933,89.891 152.933,96.952 152.032,97.79
RoomDefinition DDR_B2_D_FPGA [All] p6: confinementstyle=ConfineOut formatcopy=TRUE lockcomponents=FALSE outline 141.351,97.028 141.351,96.423 141.141,96.213 141.141,96.172 140.544,95.575 140.544,93.643 140.723,93.464 140.723,92.693 141.196,92.22 141.196,91.862 140.417,91.083 140.417,90.56 139.011,89.154 133.731,89.154 133.477,89.408 133.477,96.192 134.554,97.268 139.587,97.268 139.827,97.028
RoomDefinition DDR_B1_D_FPGA [All] p7: confinementstyle=ConfineOut formatcopy=TRUE lockcomponents=FALSE outline 140.369,96.699 140.081,96.427 140.081,90.306 140.225,90.17 146.414,90.17 146.558,90.306 146.558,95.474 144.399,97.515 143.679,97.515 142.816,96.699
RoutingVias [All] p1: holewidth=0.2 width=0.4 viastyle="Through Hole" minholewidth=0.2 minwidth=0.4 maxholewidth=0.711 maxwidth=1.27
SolderMaskExpansion [All] p1: expansion=0 istentingtop=FALSE
SupplyNets "Schematic Supply Nets_22" [InNet('VREG')] p1: voltage=0.000
SupplyNets "Schematic Supply Nets_21" [InNet('ETH_AVDD3V3')] p2: voltage=0.000
SupplyNets "Schematic Supply Nets_20" [InNet('ANA3V3')] p3: voltage=0.000
SupplyNets "Schematic Supply Nets_19" [InNet('HDMI_RX_5V0')] p4: voltage=0.000
SupplyNets "Schematic Supply Nets_18" [InNet('GND')] p5: voltage=0.000
SupplyNets "Schematic Supply Nets_17" [InNet('ETH_VCC1V8')] p6: voltage=0.000
SupplyNets "Schematic Supply Nets_16" [InNet('XADC_1V25')] p7: voltage=0.000
SupplyNets "Schematic Supply Nets_15" [InNet('HDMI_TX_5V0')] p8: voltage=0.000
SupplyNets "Schematic Supply Nets_14" [InNet('DDR3_VREF')] p9: voltage=0.000
SupplyNets "Schematic Supply Nets_13" [InNet('VU5V0')] p10: voltage=0.000
SupplyNets "Schematic Supply Nets_12" [InNet('VCC1V8')] p11: voltage=0.000
SupplyNets "Schematic Supply Nets_11" [InNet('XADC_1V8')] p12: voltage=0.000
SupplyNets "Schematic Supply Nets_10" [InNet('VCC1V35')] p13: voltage=0.000
SupplyNets "Schematic Supply Nets_9" [InNet('VJACK')] p14: voltage=0.000
SupplyNets "Schematic Supply Nets_8" [InNet('VCC5V0')] p15: voltage=0.000
SupplyNets "Schematic Supply Nets_6" [InNet('VCC5V0_FAN')] p16: voltage=0.000
SupplyNets "Schematic Supply Nets_5" [InNet('VCC1V8_IO')] p17: voltage=0.000
SupplyNets "Schematic Supply Nets_4" [InNet('VCC3V3')] p18: voltage=0.000
SupplyNets "Schematic Supply Nets_3" [InNet('VCC1V0')] p19: voltage=0.000
SupplyNets "Schematic Supply Nets_2" [InNet('USB5V0')] p20: voltage=0.000
SupplyNets "Schematic Supply Nets_1" [InNet('VREF0V9')] p21: voltage=0.000
SupplyNets "Schematic Supply Nets" [InNet('ETH_VCC1V0')] p22: voltage=0.000
Width MIPI_Width [InNetClass('MIPI_Class')] p1: maxlimit=0.131 minlimit=0.068 preferedwidth=0.125 toplayer_minwidth=0.131 toplayer_prefwidth=0.131 midlayer1_maxwidth=0.068 midlayer1_prefwidth=0.068 midlayer2_minwidth=0.125 midlayer2_maxwidth=0.125 midlayer3_minwidth=0.125 midlayer3_maxwidth=0.125 midlayer4_maxwidth=0.068 midlayer4_prefwidth=0.068 midlayer5_minwidth=0.124 midlayer5_maxwidth=0.124 midlayer5_prefwidth=0.124 midlayer6_minwidth=0.124 midlayer6_maxwidth=0.124 midlayer6_prefwidth=0.124 bottomlayer_minwidth=0.131 bottomlayer_prefwidth=0.131 impedanceprofiledriven=TRUE impedanceprofileid={5A420074-B71F-4F29-B0A2-347106C4C7D6} impedanceprofilevalue=50.000000 minimp=50.000000 maximp=50.000000 favimp=50.000000
Width DDR_ADR_CTRL_FPGA_Width [WithinRoom('DDR_ADR_CTRL_FPGA') and InNetClass('DDR_ADR_CTRL')] p2: maxlimit=0.131 minlimit=0.068 preferedwidth=0.125 toplayer_minwidth=0.131 toplayer_prefwidth=0.131 midlayer1_maxwidth=0.068 midlayer1_prefwidth=0.068 midlayer2_minwidth=0.125 midlayer2_maxwidth=0.125 midlayer3_minwidth=0.125 midlayer3_maxwidth=0.125 midlayer4_maxwidth=0.068 midlayer4_prefwidth=0.068 midlayer5_minwidth=0.124 midlayer5_maxwidth=0.124 midlayer5_prefwidth=0.124 midlayer6_minwidth=0.124 midlayer6_maxwidth=0.124 midlayer6_prefwidth=0.124 bottomlayer_minwidth=0.131 bottomlayer_prefwidth=0.131 impedanceprofiledriven=TRUE impedanceprofileid={5A420074-B71F-4F29-B0A2-347106C4C7D6} impedanceprofilevalue=50.000000 minimp=50.000000 maximp=50.000000 favimp=50.000000
Width DDR_ADR_CTRL_DDR_Width [WithinRoom('DDR_1') or WithinRoom('DDR_2') and InNetClass('DDR_ADR_CTRL')] p3: maxlimit=0.131 minlimit=0.068 preferedwidth=0.125 toplayer_minwidth=0.131 toplayer_prefwidth=0.131 midlayer1_maxwidth=0.068 midlayer1_prefwidth=0.068 midlayer2_minwidth=0.125 midlayer2_maxwidth=0.125 midlayer3_minwidth=0.125 midlayer3_maxwidth=0.125 midlayer4_maxwidth=0.068 midlayer4_prefwidth=0.068 midlayer5_minwidth=0.124 midlayer5_maxwidth=0.124 midlayer5_prefwidth=0.124 midlayer6_minwidth=0.124 midlayer6_maxwidth=0.124 midlayer6_prefwidth=0.124 bottomlayer_minwidth=0.131 bottomlayer_prefwidth=0.131 impedanceprofiledriven=TRUE impedanceprofileid={5A420074-B71F-4F29-B0A2-347106C4C7D6} impedanceprofilevalue=50.000000 minimp=50.000000 maximp=50.000000 favimp=50.000000
Width DDR_Data_Byte1_FPGA_Width [WithinRoom('DDR_B1_D_FPGA') and InNetClass('DDR_B1_D')] p4: maxlimit=0.131 minlimit=0.068 preferedwidth=0.125 toplayer_minwidth=0.131 toplayer_prefwidth=0.131 midlayer1_maxwidth=0.068 midlayer1_prefwidth=0.068 midlayer2_minwidth=0.125 midlayer2_maxwidth=0.125 midlayer3_minwidth=0.125 midlayer3_maxwidth=0.125 midlayer4_maxwidth=0.068 midlayer4_prefwidth=0.068 midlayer5_minwidth=0.124 midlayer5_maxwidth=0.124 midlayer5_prefwidth=0.124 midlayer6_minwidth=0.124 midlayer6_maxwidth=0.124 midlayer6_prefwidth=0.124 bottomlayer_minwidth=0.131 bottomlayer_prefwidth=0.131 impedanceprofiledriven=TRUE impedanceprofileid={5A420074-B71F-4F29-B0A2-347106C4C7D6} impedanceprofilevalue=50.000000 minimp=50.000000 maximp=50.000000 favimp=50.000000
Width DDR_Data_Byte1_DDR_Width [WithinRoom('DDR_1') or WithinRoom('DDR_2') and InNetClass('DDR_B1_D')] p5: maxlimit=0.131 minlimit=0.068 preferedwidth=0.125 toplayer_minwidth=0.131 toplayer_prefwidth=0.131 midlayer1_maxwidth=0.068 midlayer1_prefwidth=0.068 midlayer2_minwidth=0.125 midlayer2_maxwidth=0.125 midlayer3_minwidth=0.125 midlayer3_maxwidth=0.125 midlayer4_maxwidth=0.068 midlayer4_prefwidth=0.068 midlayer5_minwidth=0.124 midlayer5_maxwidth=0.124 midlayer5_prefwidth=0.124 midlayer6_minwidth=0.124 midlayer6_maxwidth=0.124 midlayer6_prefwidth=0.124 bottomlayer_minwidth=0.131 bottomlayer_prefwidth=0.131 impedanceprofiledriven=TRUE impedanceprofileid={5A420074-B71F-4F29-B0A2-347106C4C7D6} impedanceprofilevalue=50.000000 minimp=50.000000 maximp=50.000000 favimp=50.000000
Width DDR_Data_Byte2_FPGA_Width [WithinRoom('DDR_B2_D_FPGA') and InNetClass('DDR_B2_D')] p6: maxlimit=0.131 minlimit=0.068 preferedwidth=0.125 toplayer_minwidth=0.131 toplayer_prefwidth=0.131 midlayer1_maxwidth=0.068 midlayer1_prefwidth=0.068 midlayer2_minwidth=0.125 midlayer2_maxwidth=0.125 midlayer3_minwidth=0.125 midlayer3_maxwidth=0.125 midlayer4_maxwidth=0.068 midlayer4_prefwidth=0.068 midlayer5_minwidth=0.124 midlayer5_maxwidth=0.124 midlayer5_prefwidth=0.124 midlayer6_minwidth=0.124 midlayer6_maxwidth=0.124 midlayer6_prefwidth=0.124 bottomlayer_minwidth=0.131 bottomlayer_prefwidth=0.131 impedanceprofiledriven=TRUE impedanceprofileid={5A420074-B71F-4F29-B0A2-347106C4C7D6} impedanceprofilevalue=50.000000 minimp=50.000000 maximp=50.000000 favimp=50.000000
Width DDR_Data_Byte2_DDR_Width [WithinRoom('DDR_1') or WithinRoom('DDR_2') and InNetClass('DDR_B2_D')] p7: maxlimit=0.131 minlimit=0.068 preferedwidth=0.125 toplayer_minwidth=0.131 toplayer_prefwidth=0.131 midlayer1_maxwidth=0.068 midlayer1_prefwidth=0.068 midlayer2_minwidth=0.125 midlayer2_maxwidth=0.125 midlayer3_minwidth=0.125 midlayer3_maxwidth=0.125 midlayer4_maxwidth=0.068 midlayer4_prefwidth=0.068 midlayer5_minwidth=0.124 midlayer5_maxwidth=0.124 midlayer5_prefwidth=0.124 midlayer6_minwidth=0.124 midlayer6_maxwidth=0.124 midlayer6_prefwidth=0.124 bottomlayer_minwidth=0.131 bottomlayer_prefwidth=0.131 impedanceprofiledriven=TRUE impedanceprofileid={5A420074-B71F-4F29-B0A2-347106C4C7D6} impedanceprofilevalue=50.000000 minimp=50.000000 maximp=50.000000 favimp=50.000000
Width DDR_Data_Byte3_FPGA_Width [WithinRoom('DDR_B3_D_FPGA') and InNetClass('DDR_B3_D')] p8: maxlimit=0.131 minlimit=0.068 preferedwidth=0.125 toplayer_minwidth=0.131 toplayer_prefwidth=0.131 midlayer1_maxwidth=0.068 midlayer1_prefwidth=0.068 midlayer2_minwidth=0.125 midlayer2_maxwidth=0.125 midlayer3_minwidth=0.125 midlayer3_maxwidth=0.125 midlayer4_maxwidth=0.068 midlayer4_prefwidth=0.068 midlayer5_minwidth=0.124 midlayer5_maxwidth=0.124 midlayer5_prefwidth=0.124 midlayer6_minwidth=0.124 midlayer6_maxwidth=0.124 midlayer6_prefwidth=0.124 bottomlayer_minwidth=0.131 bottomlayer_prefwidth=0.131 impedanceprofiledriven=TRUE impedanceprofileid={5A420074-B71F-4F29-B0A2-347106C4C7D6} impedanceprofilevalue=50.000000 minimp=50.000000 maximp=50.000000 favimp=50.000000
Width DDR_Data_Byte3_DDR_Width [WithinRoom('DDR_1') or WithinRoom('DDR_2') and InNetClass('DDR_B3_D')] p9: maxlimit=0.131 minlimit=0.068 preferedwidth=0.125 toplayer_minwidth=0.131 toplayer_prefwidth=0.131 midlayer1_maxwidth=0.068 midlayer1_prefwidth=0.068 midlayer2_minwidth=0.125 midlayer2_maxwidth=0.125 midlayer3_minwidth=0.125 midlayer3_maxwidth=0.125 midlayer4_maxwidth=0.068 midlayer4_prefwidth=0.068 midlayer5_minwidth=0.124 midlayer5_maxwidth=0.124 midlayer5_prefwidth=0.124 midlayer6_minwidth=0.124 midlayer6_maxwidth=0.124 midlayer6_prefwidth=0.124 bottomlayer_minwidth=0.131 bottomlayer_prefwidth=0.131 impedanceprofiledriven=TRUE impedanceprofileid={5A420074-B71F-4F29-B0A2-347106C4C7D6} impedanceprofilevalue=50.000000 minimp=50.000000 maximp=50.000000 favimp=50.000000
Width DDR_Data_Byte4_FPGA_Width [WithinRoom('DDR_B4_D_FPGA') and InNetClass('DDR_B4_D')] p10: maxlimit=0.131 minlimit=0.068 preferedwidth=0.125 toplayer_minwidth=0.131 toplayer_prefwidth=0.131 midlayer1_maxwidth=0.068 midlayer1_prefwidth=0.068 midlayer2_minwidth=0.125 midlayer2_maxwidth=0.125 midlayer3_minwidth=0.125 midlayer3_maxwidth=0.125 midlayer4_maxwidth=0.068 midlayer4_prefwidth=0.068 midlayer5_minwidth=0.124 midlayer5_maxwidth=0.124 midlayer5_prefwidth=0.124 midlayer6_minwidth=0.124 midlayer6_maxwidth=0.124 midlayer6_prefwidth=0.124 bottomlayer_minwidth=0.131 bottomlayer_prefwidth=0.131 impedanceprofiledriven=TRUE impedanceprofileid={5A420074-B71F-4F29-B0A2-347106C4C7D6} impedanceprofilevalue=50.000000 minimp=50.000000 maximp=50.000000 favimp=50.000000
Width DDR_Data_Byte4_DDR_Width [WithinRoom('DDR_1') or WithinRoom('DDR_2') and InNetClass('DDR_B4_D')] p11: maxlimit=0.131 minlimit=0.068 preferedwidth=0.125 toplayer_minwidth=0.131 toplayer_prefwidth=0.131 midlayer1_maxwidth=0.068 midlayer1_prefwidth=0.068 midlayer2_minwidth=0.125 midlayer2_maxwidth=0.125 midlayer3_minwidth=0.125 midlayer3_maxwidth=0.125 midlayer4_maxwidth=0.068 midlayer4_prefwidth=0.068 midlayer5_minwidth=0.124 midlayer5_maxwidth=0.124 midlayer5_prefwidth=0.124 midlayer6_minwidth=0.124 midlayer6_maxwidth=0.124 midlayer6_prefwidth=0.124 bottomlayer_minwidth=0.131 bottomlayer_prefwidth=0.131 impedanceprofiledriven=TRUE impedanceprofileid={5A420074-B71F-4F29-B0A2-347106C4C7D6} impedanceprofilevalue=50.000000 minimp=50.000000 maximp=50.000000 favimp=50.000000
Width DDR_ADR_CTRL_Width [InNetClass('DDR_ADR_CTRL')] p12: maxlimit=0.207 minlimit=0.114 preferedwidth=0.205 toplayer_minwidth=0.207 toplayer_prefwidth=0.207 midlayer1_maxwidth=0.114 midlayer1_prefwidth=0.114 midlayer2_minwidth=0.205 midlayer2_maxwidth=0.205 midlayer3_minwidth=0.205 midlayer3_maxwidth=0.205 midlayer4_maxwidth=0.114 midlayer4_prefwidth=0.114 midlayer5_minwidth=0.205 midlayer5_maxwidth=0.205 midlayer6_minwidth=0.205 midlayer6_maxwidth=0.205 bottomlayer_minwidth=0.207 bottomlayer_prefwidth=0.207 impedanceprofiledriven=TRUE impedanceprofileid={675FEF74-387C-4533-B63C-E9FE042FBED2} impedanceprofilevalue=39.000000 minimp=50.000000 maximp=50.000000 favimp=50.000000
Width [All] p13: maxlimit=0.254 minlimit=0.09 preferedwidth=0.1 toplayer_maxwidth=0.1 bottomlayer_maxwidth=0.1 minimp=50.000000 maximp=50.000000 favimp=50.000000
28 further rules are at their usual default settings.

## Classes and differential pairs
net class HDMI_Source_Class: HDMI_TX0_N HDMI_TX0_P HDMI_TX1_N HDMI_TX1_P HDMI_TX2_N HDMI_TX2_P HDMI_TX_CLK_N HDMI_TX_CLK_P HDMIBUF_CLK_N HDMIBUF_CLK_P HDMIBUF_D0_N HDMIBUF_D0_P HDMIBUF_D1_N HDMIBUF_D1_P HDMIBUF_D2_N HDMIBUF_D2_P HDMICON_CLK_N HDMICON_CLK_P HDMICON_D0_N HDMICON_D0_P HDMICON_D1_N HDMICON_D1_P HDMICON_D2_N HDMICON_D2_P
net class HDMI_Sink_Class: HDMI_RX0_N HDMI_RX0_P HDMI_RX1_N HDMI_RX1_P HDMI_RX2_N HDMI_RX2_P HDMI_RX_CLK_N HDMI_RX_CLK_P RX0_N RX0_P RX1_N RX1_P RX2_N RX2_P RXC_N RXC_P
net class MIPI_Class: CAM_CLK CAM_GPIO CAM_SCL CAM_SDA LP_CLK_N LP_CLK_P LP_LANE0_N LP_LANE0_P LP_LANE1_N LP_LANE1_P MIPI_CLK_N MIPI_CLK_P MIPI_LANE0_N MIPI_LANE0_P MIPI_LANE1_N MIPI_LANE1_P
net class DDR_ADR_CTRL: DDR3_A0 DDR3_A0_FPGA DDR3_A1 DDR3_A1_FPGA DDR3_A2 DDR3_A2_FPGA DDR3_A3 DDR3_A3_FPGA DDR3_A4 DDR3_A4_FPGA DDR3_A5 DDR3_A5_FPGA DDR3_A6 DDR3_A6_FPGA DDR3_A7 DDR3_A7_FPGA DDR3_A8 DDR3_A8_FPGA DDR3_A9 DDR3_A9_FPGA DDR3_A10 DDR3_A10_FPGA DDR3_A11 DDR3_A11_FPGA DDR3_A12 DDR3_A12_FPGA DDR3_A13 DDR3_A13_FPGA DDR3_A14 DDR3_A14_FPGA DDR3_BA0 DDR3_BA0_FPGA DDR3_BA1 DDR3_BA1_FPGA DDR3_BA2 DDR3_BA2_FPGA DDR3_CAS DDR3_CAS_FPGA DDR3_CK_N DDR3_CK_P DDR3_CKE0 DDR3_CKE0_FPGA DDR3_CS DDR3_CS_FPGA DDR3_ODT0 DDR3_ODT0_FPGA DDR3_RAS DDR3_RAS_FPGA DDR3_RESET DDR3_WE DDR3_WE_FPGA Net1_G5 Net1_H5
component class "Components Class3": C86 C87
component class "Components Class2": C87
component class "Components Class1": C86
net class DDR_B3_D: DDR3_D16 DDR3_D17 DDR3_D18 DDR3_D19 DDR3_D20 DDR3_D21 DDR3_D22 DDR3_D23 DDR3_DM2 DDR3_DQS2_N DDR3_DQS2_P
net class DDR_B2_D: DDR3_D8 DDR3_D9 DDR3_D10 DDR3_D11 DDR3_D12 DDR3_D13 DDR3_D14 DDR3_D15 DDR3_DM1 DDR3_DQS1_N DDR3_DQS1_P
net class DDR_B1_D: DDR3_D0 DDR3_D1 DDR3_D2 DDR3_D3 DDR3_D4 DDR3_D5 DDR3_D6 DDR3_D7 DDR3_DM0 DDR3_DQS0_N DDR3_DQS0_P
net class DDR_B4_D: DDR3_D24 DDR3_D25 DDR3_D26 DDR3_D27 DDR3_D28 DDR3_D29 DDR3_D30 DDR3_D31 DDR3_DM3 DDR3_DQS3_N DDR3_DQS3_P
component class USB_OTG: C66 C67 C68 C69 C70 C71 C232 C233 J8 J9 P7 P8 R187 R188 R189 R190 R191 R192 R193 R194 R195 U20 U21
component class Power_Regulation: C200 C201 C202 C203 C204 C205 C206 C207 C208 C209 C210 C211 C212 C213 C214 C215 C216 C217 C218 C219 C220 C221 C222 C223 C224 C225 C226 C227 C228 C229 C230 C231 D17 D18 DS11 IC5 J10 L6 L7 L8 L9 P15 Q7 Q8 R271 R272 R273 R274 R275 R276 R277 R278 R279 R280 R281 R282 R283 R284 R285 R286 R287 R288 R289 R290 R291 R292 R293 R294 R295 R296 R297 R298 R299 R300 R301 R302 R303 R304 R305 R306 R307 R308 R309 SW13 U27 U28 U29
component class PMODs_MIO: DS1 P1 P2 P3 P4 P5 P6 R1 R2 R3 R4 R5 R6 R7 R8 R9 R10 R11 R12 R13 R14 R15 R16 R17 R18 R19 R20 R21 R22 R23 R24 R25 R26 R27 R28 R29 R30 R31 R32 R33 R34 R35 R36 R37 R38 R39 R40 R41 R42 R43 R44 R45 SW1 SW2 U1 U2 U3 U4 U5 U6 U7 U8 U9 U10 U11 U12
component class MIPI_General_IO: D3 D4 D5 D6 D7 DS2 DS3 DS4 DS5 J1 Q1 Q2 Q3 Q4 Q5 Q6 R46 R47 R48 R49 R50 R51 R52 R53 R54 R55 R56 R57 R58 R59 R60 R61 R62 R63 R64 R65 R66 R67 R68 R69 R70 R71 R72 R73 R74 R75 R76 R77 R78 R79 R80 R81 R82 R83 R84 R85 R86 R87 R88 SW3 SW4 SW5 SW6 SW7 SW8 SW9 SW10
component class HDMI_Source: C53 C54 C55 C56 C57 D2 F1 IC3 IC4 J6 L1 L2 L3 L4 R91 R138 R139 R140 R141 R142 R143 R144 R145 R146 R147 R148 R149 R150 R151 R152 R153 R154 R155 U17
component class HDMI_Sink: C58 C59 C60 C61 C62 C63 C64 C65 D12 D13 DS9 J7 R156 R157 R158 R159 R160 R161 R162 R163 R164 R165 R166 R167 R168 R169 R170 R171 R172 R173 R174 R175 R176 R177 R178 R179 R180 R181 R182 R183 R184 R185 R186 U18 U19
component class FPGA_Power: C86 C87 C88 C89 C90 C91 C92 C93 C94 C95 C96 C97 C98 C99 C100 C101 C102 C103 C104 C105 C106 C107 C108 C109 C110 C111 C112 C113 C114 C115 C116 C117 C118 C119 C120 C121 C122 C123 C124 C125 C126 C127 C128 C129 C130 C131 C132 C133 C134 C135 C136 C137 C138 C139 C140 C141 C142 C143 C144 C145 C146 C147 C148 C149 C150 C151 C152 C153 C154 C155 C156 C157 FB7 P14 R267
component class FPGA_Config_Flash: 1 C72 C73 C74 C75 C76 C77 D14 D15 D16 DS10 P9 P10 R196 R197 R198 R199 R200 R201 R202 R203 R204 R205 R206 SW11 U22 U23 U24
component class FPGA_Banks_and_Filters: C82 C83 C84 C85 R259 R260 R261 R262 R263 R264 R265 R266
component class Ethernet_and_SD_Card: C1 C2 C3 C4 C5 C6 C7 C8 C9 C11 C12 C13 C14 C15 C16 C17 C18 C19 C20 C21 C23 C24 C25 C26 D1 D9 D10 D11 DS6 DS7 DS8 FB1 FB2 FB8 IC1 IC2 J2 R89 R90 R93 R94 R95 R96 R97 R98 R99 R100 R101 R102 R103 R104 R105 R106 R107 R108 R109 R110 R111 R112 R113 R114 R115 R116 R117 R118 SD1 Y1
component class DDR_and_MIO_Banks: C78 C79 C80 C81 P11 P12 P13 R207 R208 R209 R210 R211 R212 R213 R214 R215 R216 R217 R218 R219 R220 R221 R222 R223 R224 R225 R226 R227 R228 R229 R230 R231 R232 R233 R234 R235 R236 R237 R238 R239 R240 R241 R242 R243 R244 R245 R246 R247 R248 R249 R250 R251 R252 R253 R254 R255 R256 R257 R258 SW12 Y3
component class DDR3_Memory: C158 C159 C160 C161 C162 C163 C164 C165 C166 C167 C168 C169 C170 C171 C172 C173 C174 C175 C176 C177 C178 C179 C180 C181 C182 C183 C184 C185 C186 C187 C188 C189 C190 C191 C192 C193 C194 C195 C196 C197 C198 C199 R268 R269 R270 U25 U26
component class Audio_Codec: C27 C28 C29 C30 C31 C32 C33 C34 C35 C36 C37 C38 C39 C40 C41 C42 C43 C44 C45 C46 C47 C48 C49 C50 C51 C52 FB3 FB4 FB5 FB6 J3 J4 J5 R119 R120 R121 R122 R123 R124 R125 R126 R127 R128 R129 R130 R131 R132 R133 R134 R135 R136 R137 U15 U16 Y2
differential pair JA4_R: +JA4_R_P -JA4_R_N
differential pair JA3_R: +JA3_R_P -JA3_R_N
differential pair JA2_R: +JA2_R_P -JA2_R_N
differential pair JA1_R: +JA1_R_P -JA1_R_N
differential pair OTG_D: +OTG_D_P -OTG_D_N
differential pair JA4: +JA4_P -JA4_N
differential pair JA3: +JA3_P -JA3_N
differential pair JA2: +JA2_P -JA2_N
differential pair JA1: +JA1_P -JA1_N
differential pair RXC: +RXC_P -RXC_N
differential pair RX2: +RX2_P -RX2_N
differential pair RX1: +RX1_P -RX1_N
differential pair RX0: +RX0_P -RX0_N
differential pair MIPI_LANE1: +MIPI_LANE1_P -MIPI_LANE1_N
differential pair MIPI_LANE0: +MIPI_LANE0_P -MIPI_LANE0_N
differential pair MIPI_CLK: +MIPI_CLK_P -MIPI_CLK_N
differential pair JD4: +JD4_P -JD4_N
differential pair JD3: +JD3_P -JD3_N
differential pair JD2: +JD2_P -JD2_N
differential pair JD1: +JD1_P -JD1_N
differential pair JC4: +JC4_P -JC4_N
differential pair JC3: +JC3_P -JC3_N
differential pair JC2: +JC2_P -JC2_N
differential pair JC1: +JC1_P -JC1_N
differential pair JB4: +JB4_P -JB4_N
differential pair JB3: +JB3_P -JB3_N
differential pair JB2: +JB2_P -JB2_N
differential pair JB1: +JB1_P -JB1_N
differential pair HDMICON_D2: +HDMICON_D2_P -HDMICON_D2_N
differential pair HDMICON_D1: +HDMICON_D1_P -HDMICON_D1_N
differential pair HDMICON_D0: +HDMICON_D0_P -HDMICON_D0_N
differential pair HDMICON_CLK: +HDMICON_CLK_P -HDMICON_CLK_N
differential pair HDMIBUF_D2: +HDMIBUF_D2_P -HDMIBUF_D2_N
differential pair HDMIBUF_D1: +HDMIBUF_D1_P -HDMIBUF_D1_N
differential pair HDMIBUF_D0: +HDMIBUF_D0_P -HDMIBUF_D0_N
differential pair HDMIBUF_CLK: +HDMIBUF_CLK_P -HDMIBUF_CLK_N
differential pair HDMI_TX_CLK: +HDMI_TX_CLK_P -HDMI_TX_CLK_N
differential pair HDMI_TX2: +HDMI_TX2_P -HDMI_TX2_N
differential pair HDMI_TX1: +HDMI_TX1_P -HDMI_TX1_N
differential pair HDMI_TX0: +HDMI_TX0_P -HDMI_TX0_N
differential pair HDMI_RX_CLK: +HDMI_RX_CLK_P -HDMI_RX_CLK_N
differential pair HDMI_RX2: +HDMI_RX2_P -HDMI_RX2_N
differential pair HDMI_RX1: +HDMI_RX1_P -HDMI_RX1_N
differential pair HDMI_RX0: +HDMI_RX0_P -HDMI_RX0_N
differential pair ETH_TD3: +ETH_TD3_P -ETH_TD3_N
differential pair ETH_TD2: +ETH_TD2_P -ETH_TD2_N
differential pair ETH_TD1: +ETH_TD1_P -ETH_TD1_N
differential pair ETH_TD0: +ETH_TD0_P -ETH_TD0_N
differential pair DDR3_DQS3: +DDR3_DQS3_P -DDR3_DQS3_N
differential pair DDR3_DQS2: +DDR3_DQS2_P -DDR3_DQS2_N
differential pair DDR3_DQS1: +DDR3_DQS1_P -DDR3_DQS1_N
differential pair DDR3_DQS0: +DDR3_DQS0_P -DDR3_DQS0_N
differential pair DDR3_CK: +DDR3_CK_P -DDR3_CK_N

## Components (designator, comment, footprint, x,y, rotation, side; value= is the part's Value field where it differs from the comment)
1 "XC7Z020-1CLG400C" BGA400C80P20X20_1700X1700X160 145.942,102.318 r90 top
C1 "1u" C_0805 90.297,117.094 r90 bottom
C2 "4u7" C_0805 104.318,113.157 r180 bottom
C3 "100n" CAPC1005X50N_0402 100.889,114.3 r270 bottom
C4 "100n" CAPC1005X50N_0402 101.651,117.602 r0 bottom
C5 "100n" CAPC1005X50N_0402 100,119.253 r90 bottom
C6 "100n" CAPC1005X50N_0402 97.968,119.253 r90 bottom
C7 "100n" CAPC1005X50N_0402 97.46,114.554 r180 bottom
C8 "4u7" C_0805 108.534,110.439 r90 bottom
C9 "4u7" C_0805 111.328,110.439 r90 bottom
C11 "27p" CAPC1005X50N_0402 101.092,109.728 r90 bottom
C12 "27p" CAPC1005X50N_0402 110.973,118.262 r180 top
C13 "27p" CAPC1005X50N_0402 107.823,118.288 r180 top
C14 "27p" CAPC1005X50N_0402 111.125,116.332 r180 top
C15 "4u7" C_0805 93.269,123.342 r180 bottom
C16 "100n" CAPC1005X50N_0402 93.269,124.993 r180 bottom
C17 "4u7" C_0805 93.269,121.183 r180 bottom
C18 "100n" CAPC1005X50N_0402 96.952,117.729 r90 bottom
C19 "100n" CAPC1005X50N_0402 174.244,129.286 r90 bottom
C20 "100n" CAPC1005X50N_0402 169.545,131.445 r180 bottom
C21 "100n" CAPC1005X50N_0402 164.846,138.684 r0 bottom
C23 "4u7" C_0805 111.201,118.059 r90 bottom
C24 "100n" CAPC1005X50N_0402 109.55,118.694 r90 bottom
C25 "4u7" C_0805 107.899,118.059 r90 bottom
C26 "100n" CAPC1005X50N_0402 101.651,112.395 r0 bottom
C27 "100n" CAPC1005X50N_0402 137.328,119.913 r0 top
C28 "10u" C_0805 138.217,117.881 r0 bottom
C29 "10u" C_0805 140.503,123.596 r180 bottom
C30 "100n" CAPC1005X50N_0402 140.249,124.104 r180 top
C31 "100u" C_1210 145.745,127.305 r90 top
C32 "100n" CAPC1005X50N_0402 135.55,119.913 r180 top
C33 "10u" C_0805 134.788,117.881 r180 bottom
C34 "10u" C_0805 137.836,128.168 r270 bottom
C35 "100n" CAPC1005X50N_0402 136.82,127.279 r0 top
C36 "100u" C_1210 140.208,130.048 r180 top
C37 "220p" CAPC1005X50N_0402 145.939,131.267 r180 top
C38 "220p" CAPC1005X50N_0402 136.423,130.48 r0 top
C39 "1u" C_0402 129.362,131.191 r0 top
C40 "220p" CAPC1005X50N_0402 132.232,130.962 r90 top
C41 "1u" C_0402 124.079,130.75 r180 top
C42 "10u" C_0805 133.772,127.66 r270 bottom
C43 "100n" CAPC1005X50N_0402 135.042,127.279 r180 top
C44 "1u" C_0402 116.535,127.33 r90 top
C45 "27p" CAPC1005X50N_0402 133.985,119.786 r90 top
C46 "27p" CAPC1005X50N_0402 131.623,121.463 r0 top
C47 "220p" CAPC1005X50N_0402 121.412,130.242 r90 top
C48 "220p" CAPC1005X50N_0402 116.932,129.134 r180 top
C49 "10u" C_0805 147.895,124.13 r270 bottom
C50 "1u" CAPC1005X50N_0402 145.355,122.987 r0 bottom
C51 "1u" CAPC1005X50N_0402 145.355,128.829 r0 bottom
C52 "10u" C_0805 147.895,127.813 r90 bottom
C53 "100n" CAPC1005X50N_0402 185.115,85.877 r180 top
C54 "1n" CAPC1005X50N_0402 192.347,82.626 r0 top
C55 "100n" CAPC1005X50N_0402 188.062,95.199 r0 top
C56 "100n" CAPC1005X50N_0402 191.491,102.311 r180 top
C57 "100n" CAPC1005X50N_0402 192.761,101.041 r270 top
C58 "10n" CAPC1005X50N_0402 182.286,127.527 r270 top
C59 "10n" CAPC1005X50N_0402 180.213,123.952 r270 top
C60 "10n" CAPC1005X50N_0402 185.334,127.527 r270 top
C61 "10n" CAPC1005X50N_0402 189.271,123.717 r180 top
C62 "10n" CAPC1005X50N_0402 189.271,122.066 r180 top
C63 "10n" CAPC1005X50N_0402 182.286,118.256 r90 top
C64 "10n" CAPC1005X50N_0402 185.347,118.32 r90 top
C65 "100n" CAPC1005X50N_0402 190.757,125.864 r90 top
C66 "100n" CAPC1005X50N_0402 105.284,63.912 r270 bottom
C67 "100n" CAPC1005X50N_0402 104.268,63.912 r270 bottom
C68 "100n" CAPC1005X50N_0402 106.427,63.912 r270 bottom
C69 "100n" CAPC1005X50N_0402 105.284,73.056 r270 top
C70 "1n" CAPC1005X50N_0402 91.441,68.838 r0 bottom
C71 "100n" CAPC1005X50N_0402 100.331,66.198 r90 top
C72 "100n" CAPC1005X50N_0402 160.96,107.264 r180 top
C73 "100n" CAPC1005X50N_0402 123.19,99.314 r0 top
C74 "100n" CAPC1005X50N_0402 114.173,28.067 r90 top
C75 "100n" CAPC1005X50N_0402 115.062,28.067 r90 top
C76 "150u" FP-TAJD-MFG 167.437,117.5 r0 top
C77 "47u" C_1210 129.54,40.513 r90 top
C78 "100n" CAPC1005X50N_0402 148.017,99.06 r0 bottom
C79 "10n" CAPC1005X50N_0402 159.984,71.349 r270 bottom
C80 "10n" CAPC1005X50N_0402 133.35,103.505 r270 bottom
C81 "100n" CAPC1005X50N_0402 129.54,97.663 r0 bottom
C82 "1n" CAPC1005X50N_0402 197.231,103.124 r270 top
C83 "1n" CAPC1005X50N_0402 197.231,105.029 r90 top
C84 "1n" CAPC1005X50N_0402 195.326,107.315 r270 top
C85 "1n" CAPC1005X50N_0402 197.231,101.219 r270 top
C86 "470n" CAPC1005X50N_0402 151.13,95.061 r270 bottom
C87 "470n" CAPC1005X50N_0402 152.739,95.897 r90 bottom
C88 "470n" CAPC1005X50N_0402 149.349,98.87 r270 bottom
C89 "470n" CAPC1005X50N_0402 133.299,163.5 r90 bottom
C90 "470n" CAPC1005X50N_0402 153.699,98.709 r90 bottom
C91 "470n" CAPC1005X50N_0402 151.257,100.584 r90 bottom
C92 "470n" CAPC1005X50N_0402 155.423,100.355 r0 bottom
C93 "47u" C_1210 125.095,40.513 r90 top
C94 "100u" C_1210 108.585,40.513 r90 top
C95 "100u" C_1210 111.887,40.513 r90 top
C96 "4u7" C_0805 125.603,34.163 r90 top
C97 "4u7" C_0805 127.635,34.163 r90 top
C98 "4u7" C_0805 129.667,34.163 r90 top
C99 "470n" CAPC1005X50N_0402 140.081,110.49 r270 bottom
C100 "470n" CAPC1005X50N_0402 145.796,110.49 r270 bottom
C101 "470n" CAPC1005X50N_0402 143.524,107.406 r0 bottom
C102 "470n" CAPC1005X50N_0402 148.082,110.49 r270 bottom
C103 "470n" CAPC1005X50N_0402 148.971,110.49 r270 bottom
C104 "4u7" C_0805 97.155,34.163 r90 top
C105 "4u7" C_0805 99.187,34.163 r90 top
C106 "4u7" C_0805 107.315,34.163 r90 top
C107 "100u" C_1210 98.679,40.513 r90 top
C108 "4u7" C_0805 131.699,34.163 r90 top